# Altium PCB Baseboard-SupervisorElite.PcbDoc (part 1 of 8)
Units mm, origin at the board's own origin, x right, y up, seen from the top; angles counter-clockwise.
Board outline 120 x 90 mm, 6 copper layers (Top Layer, SIGNAL-1, PWR, SIGNAL-2, GND-2, Bottom Layer), stack 1.705 mm thick; 419 components, 315 nets, 1504 pads, 603 vias.
Unrouted connection lines stored in the file: 357.
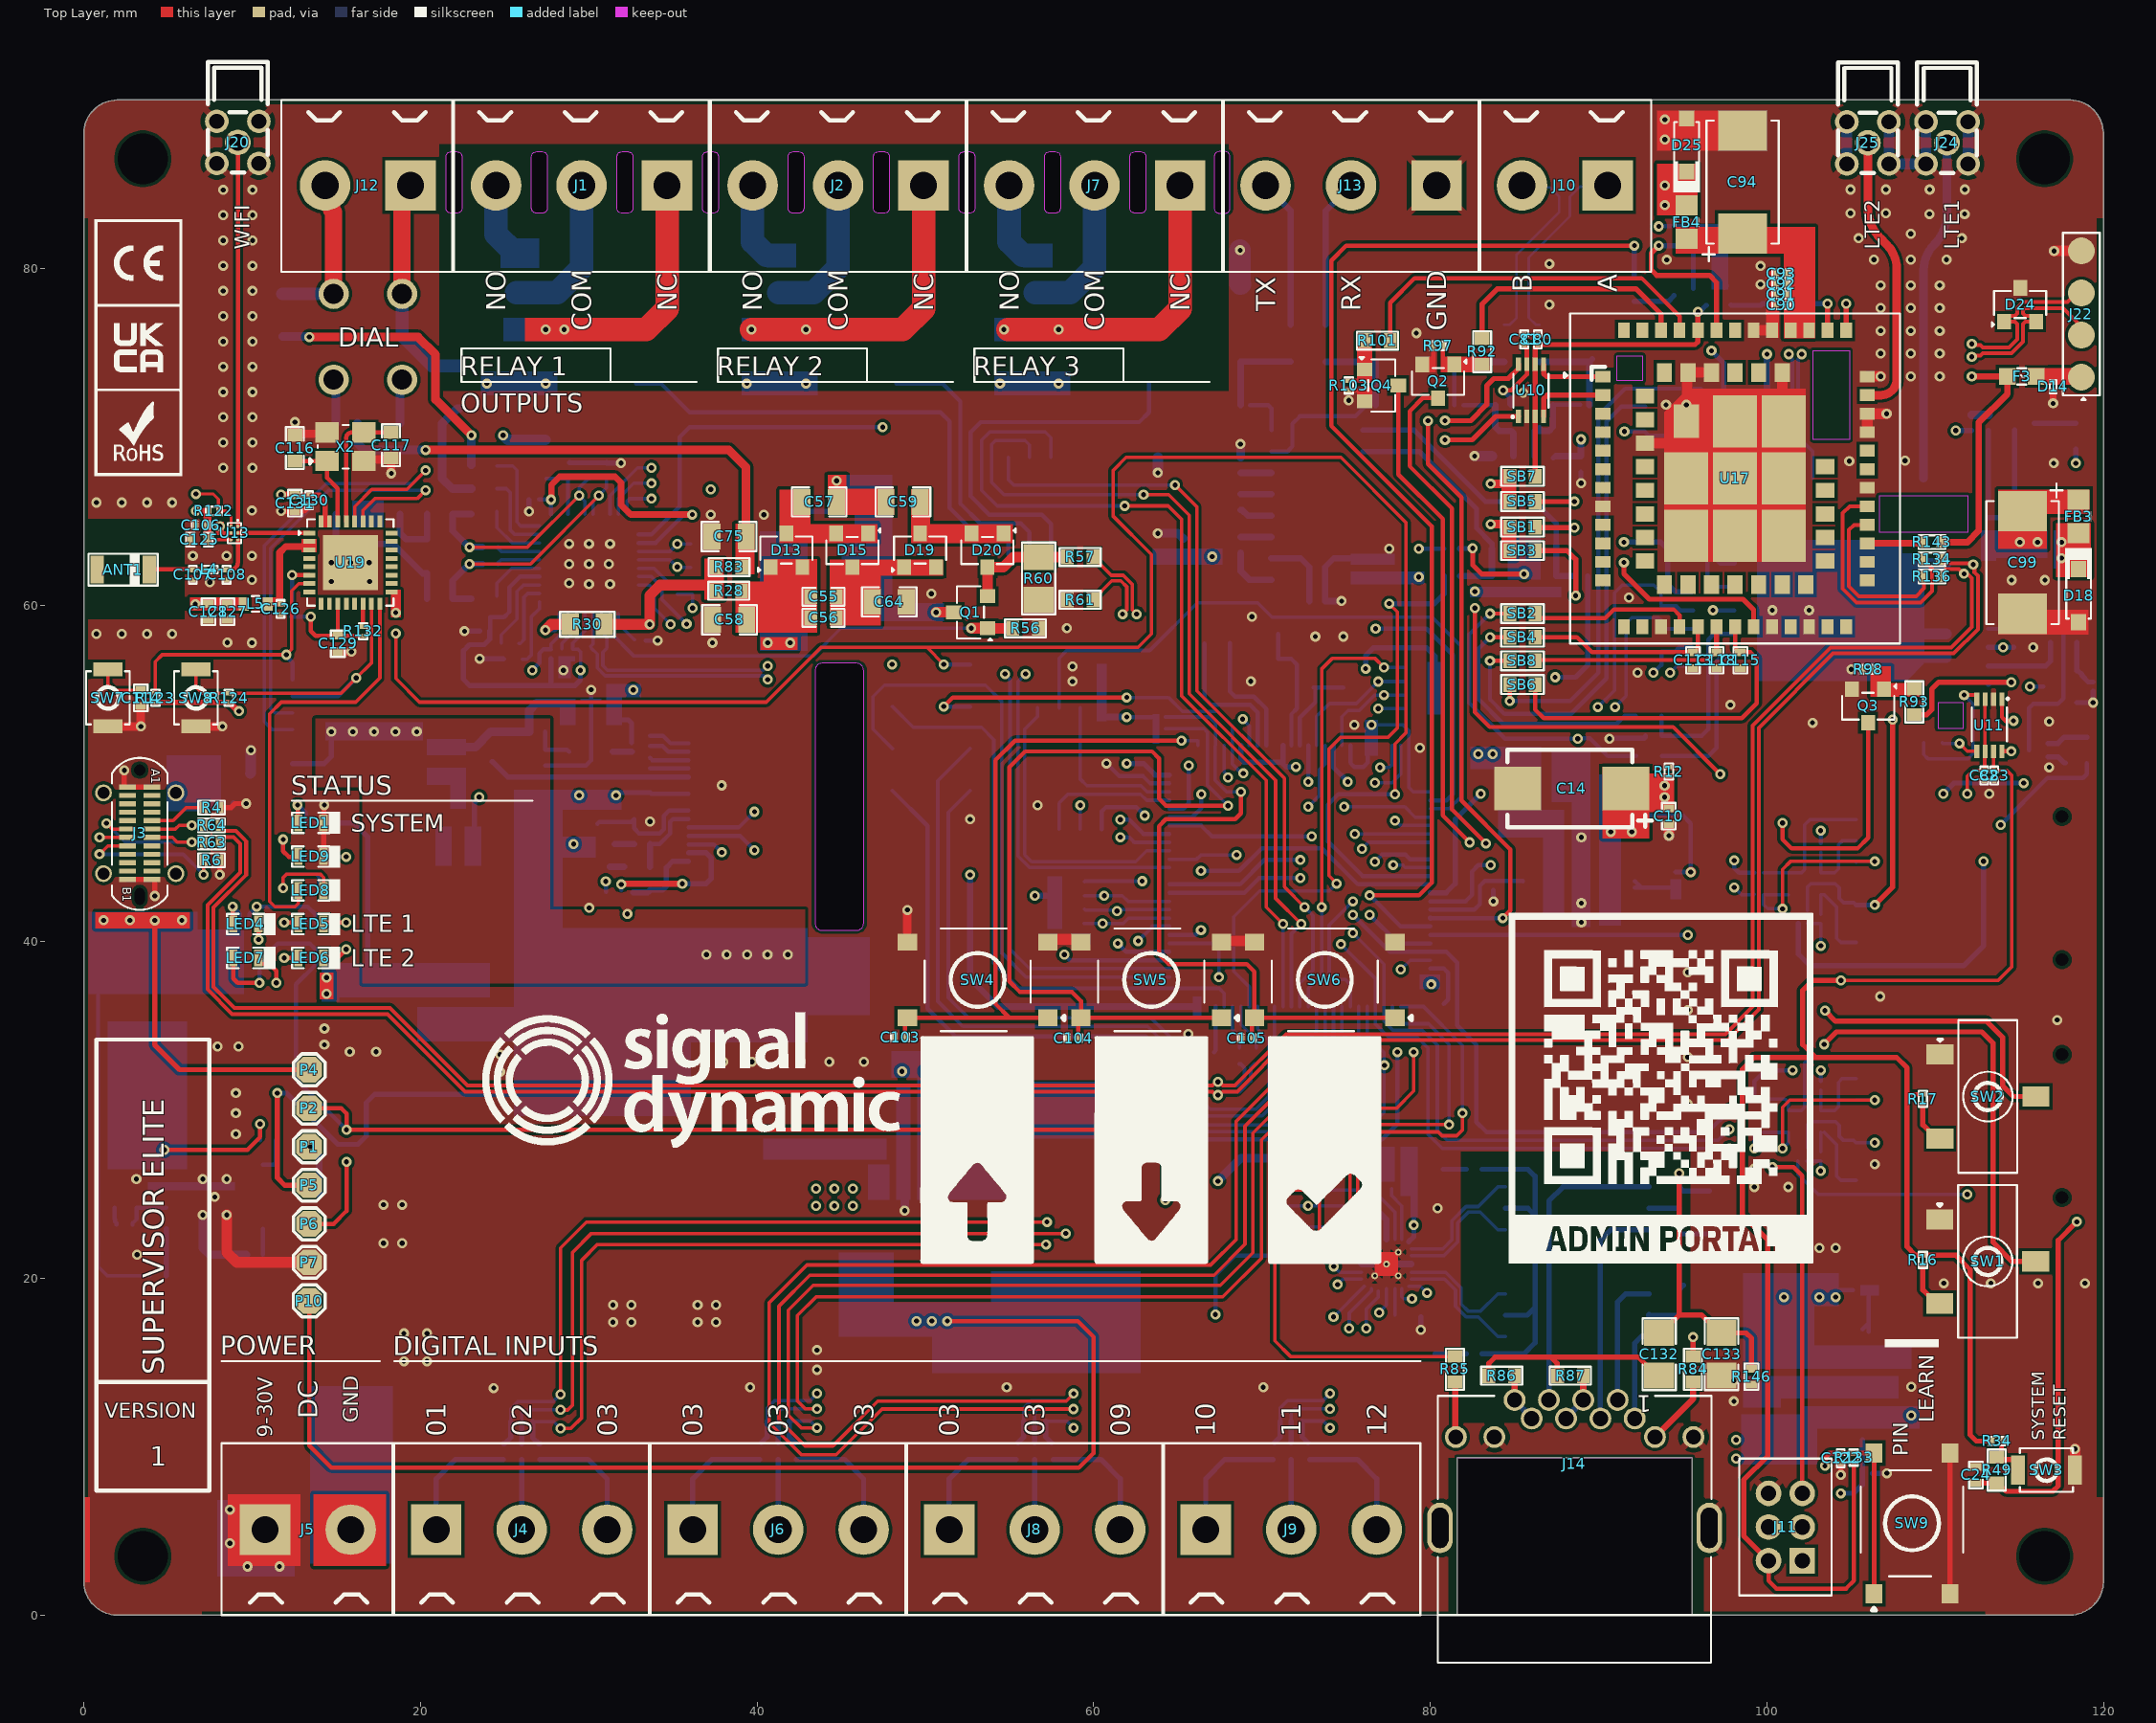
[diagram p0: Top Layer view]
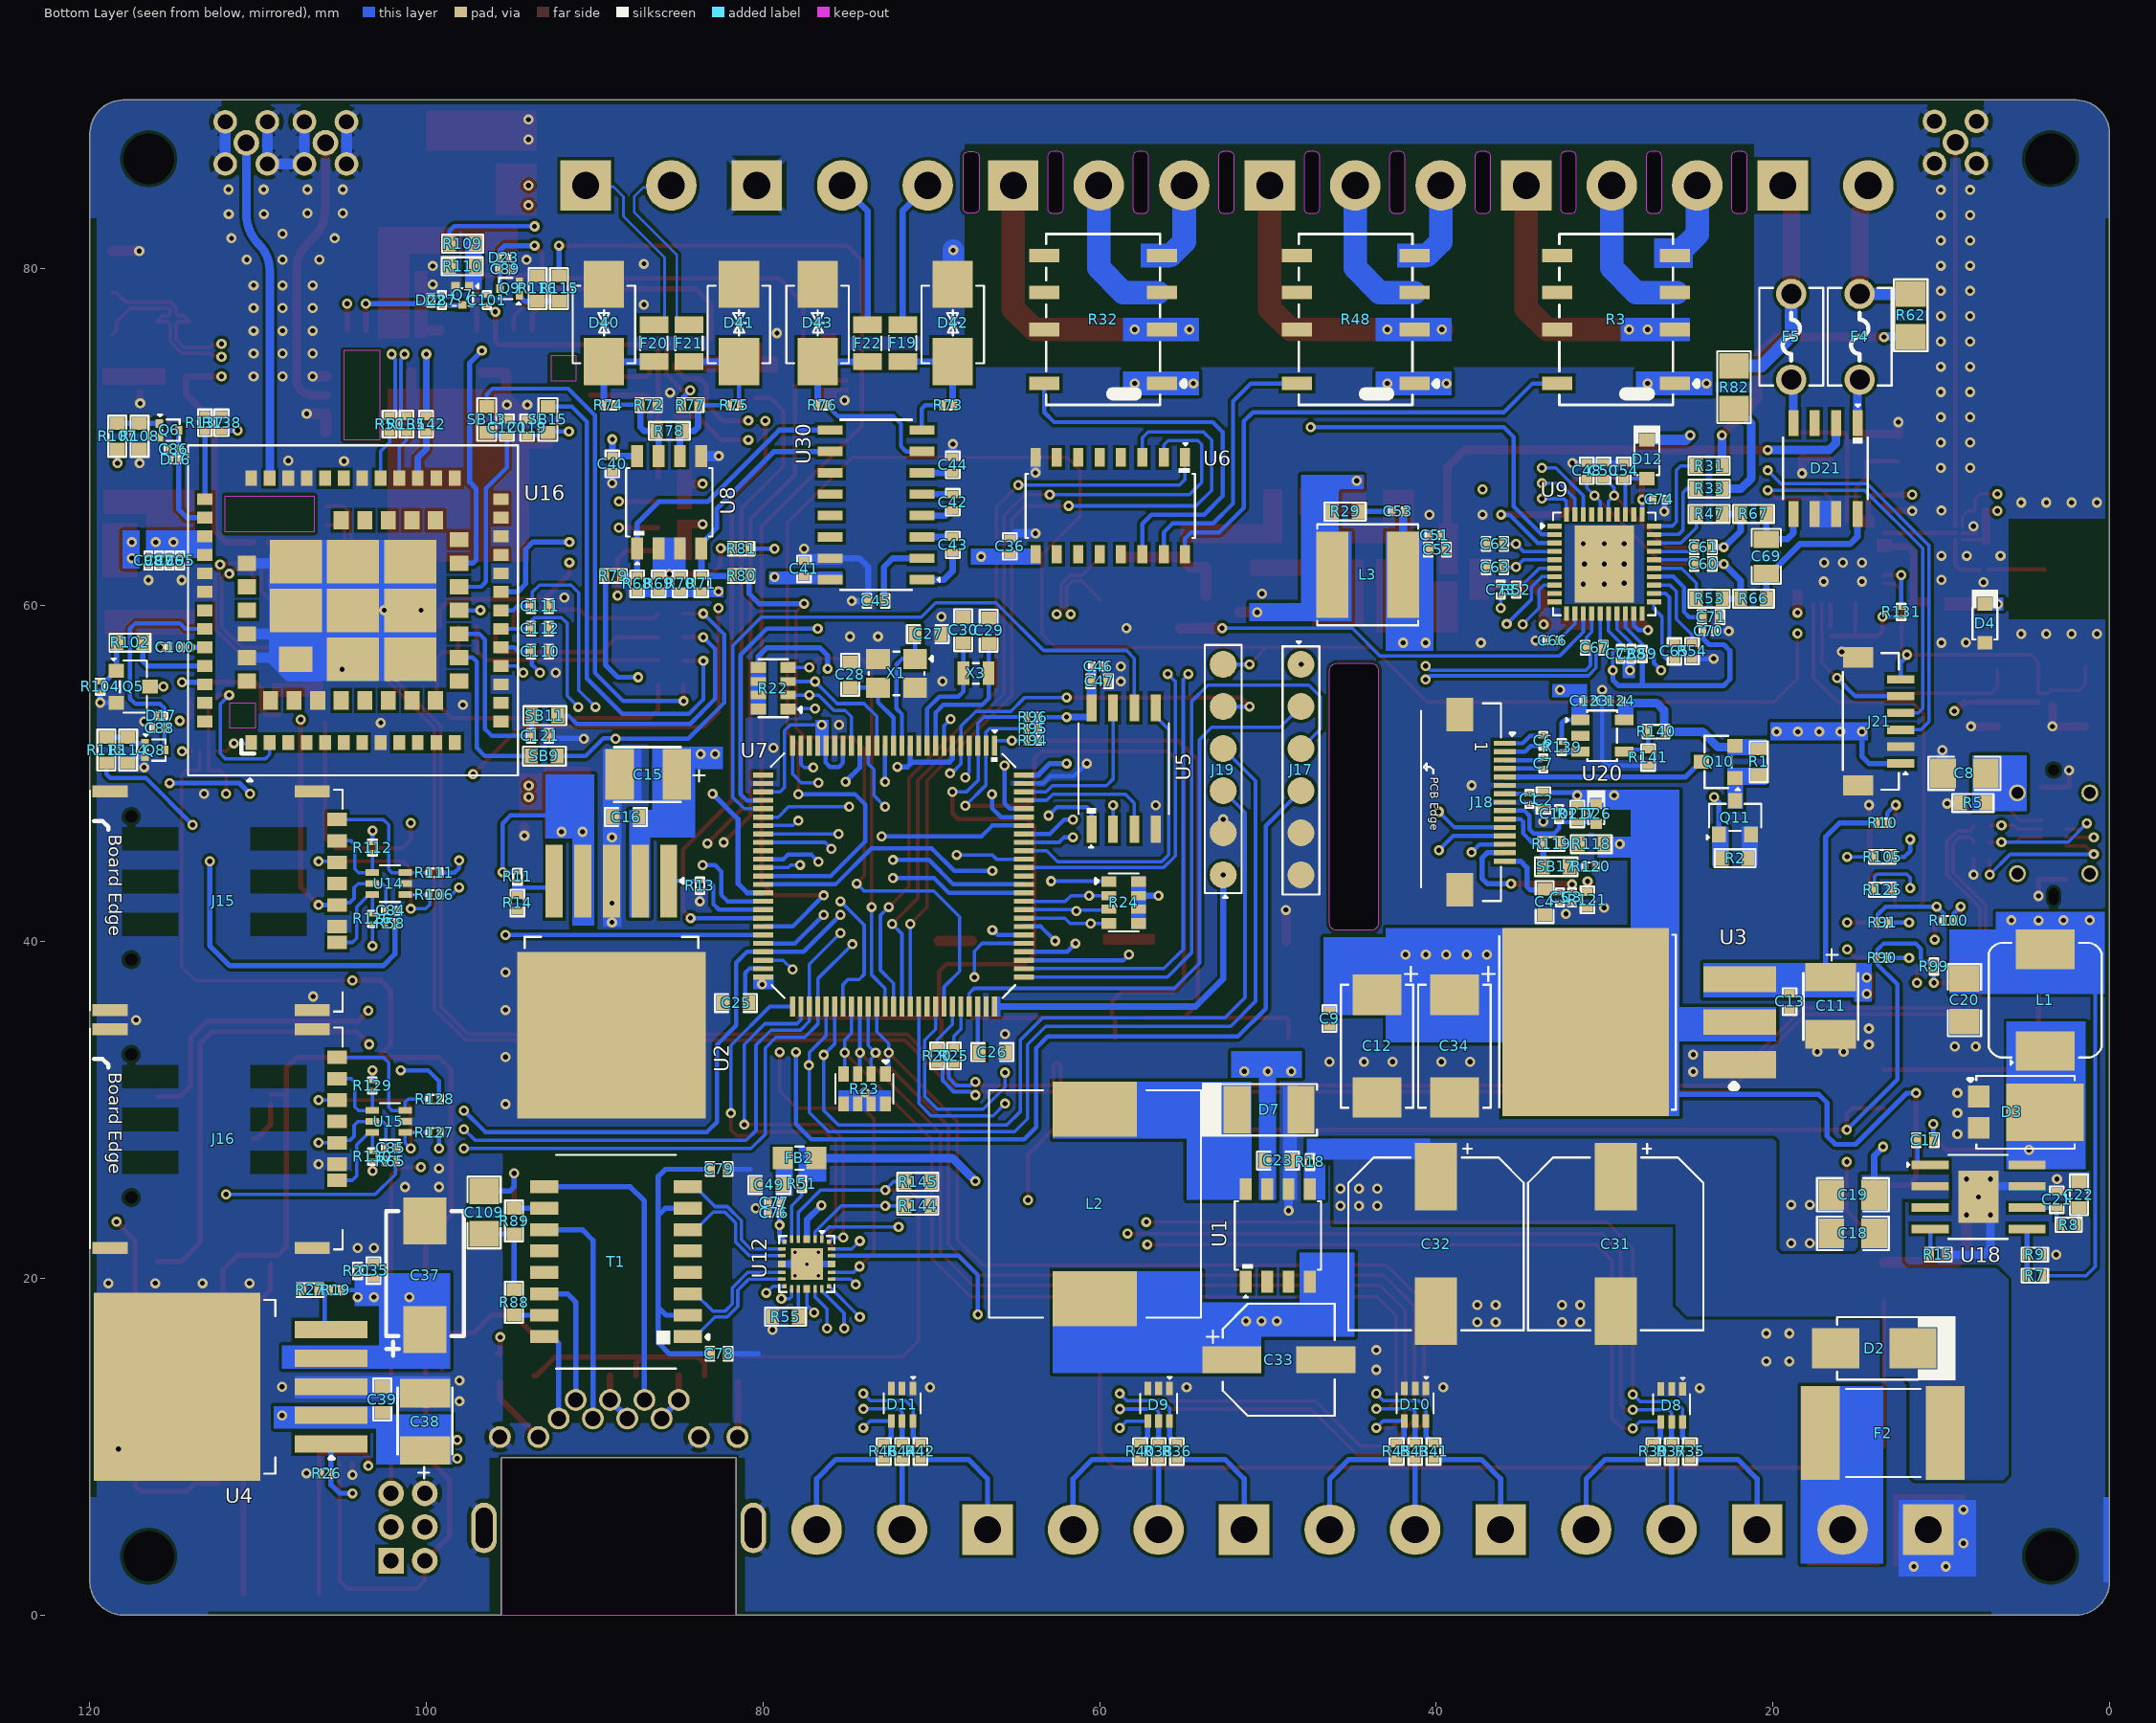
[diagram p1: Bottom Layer view, seen from below]
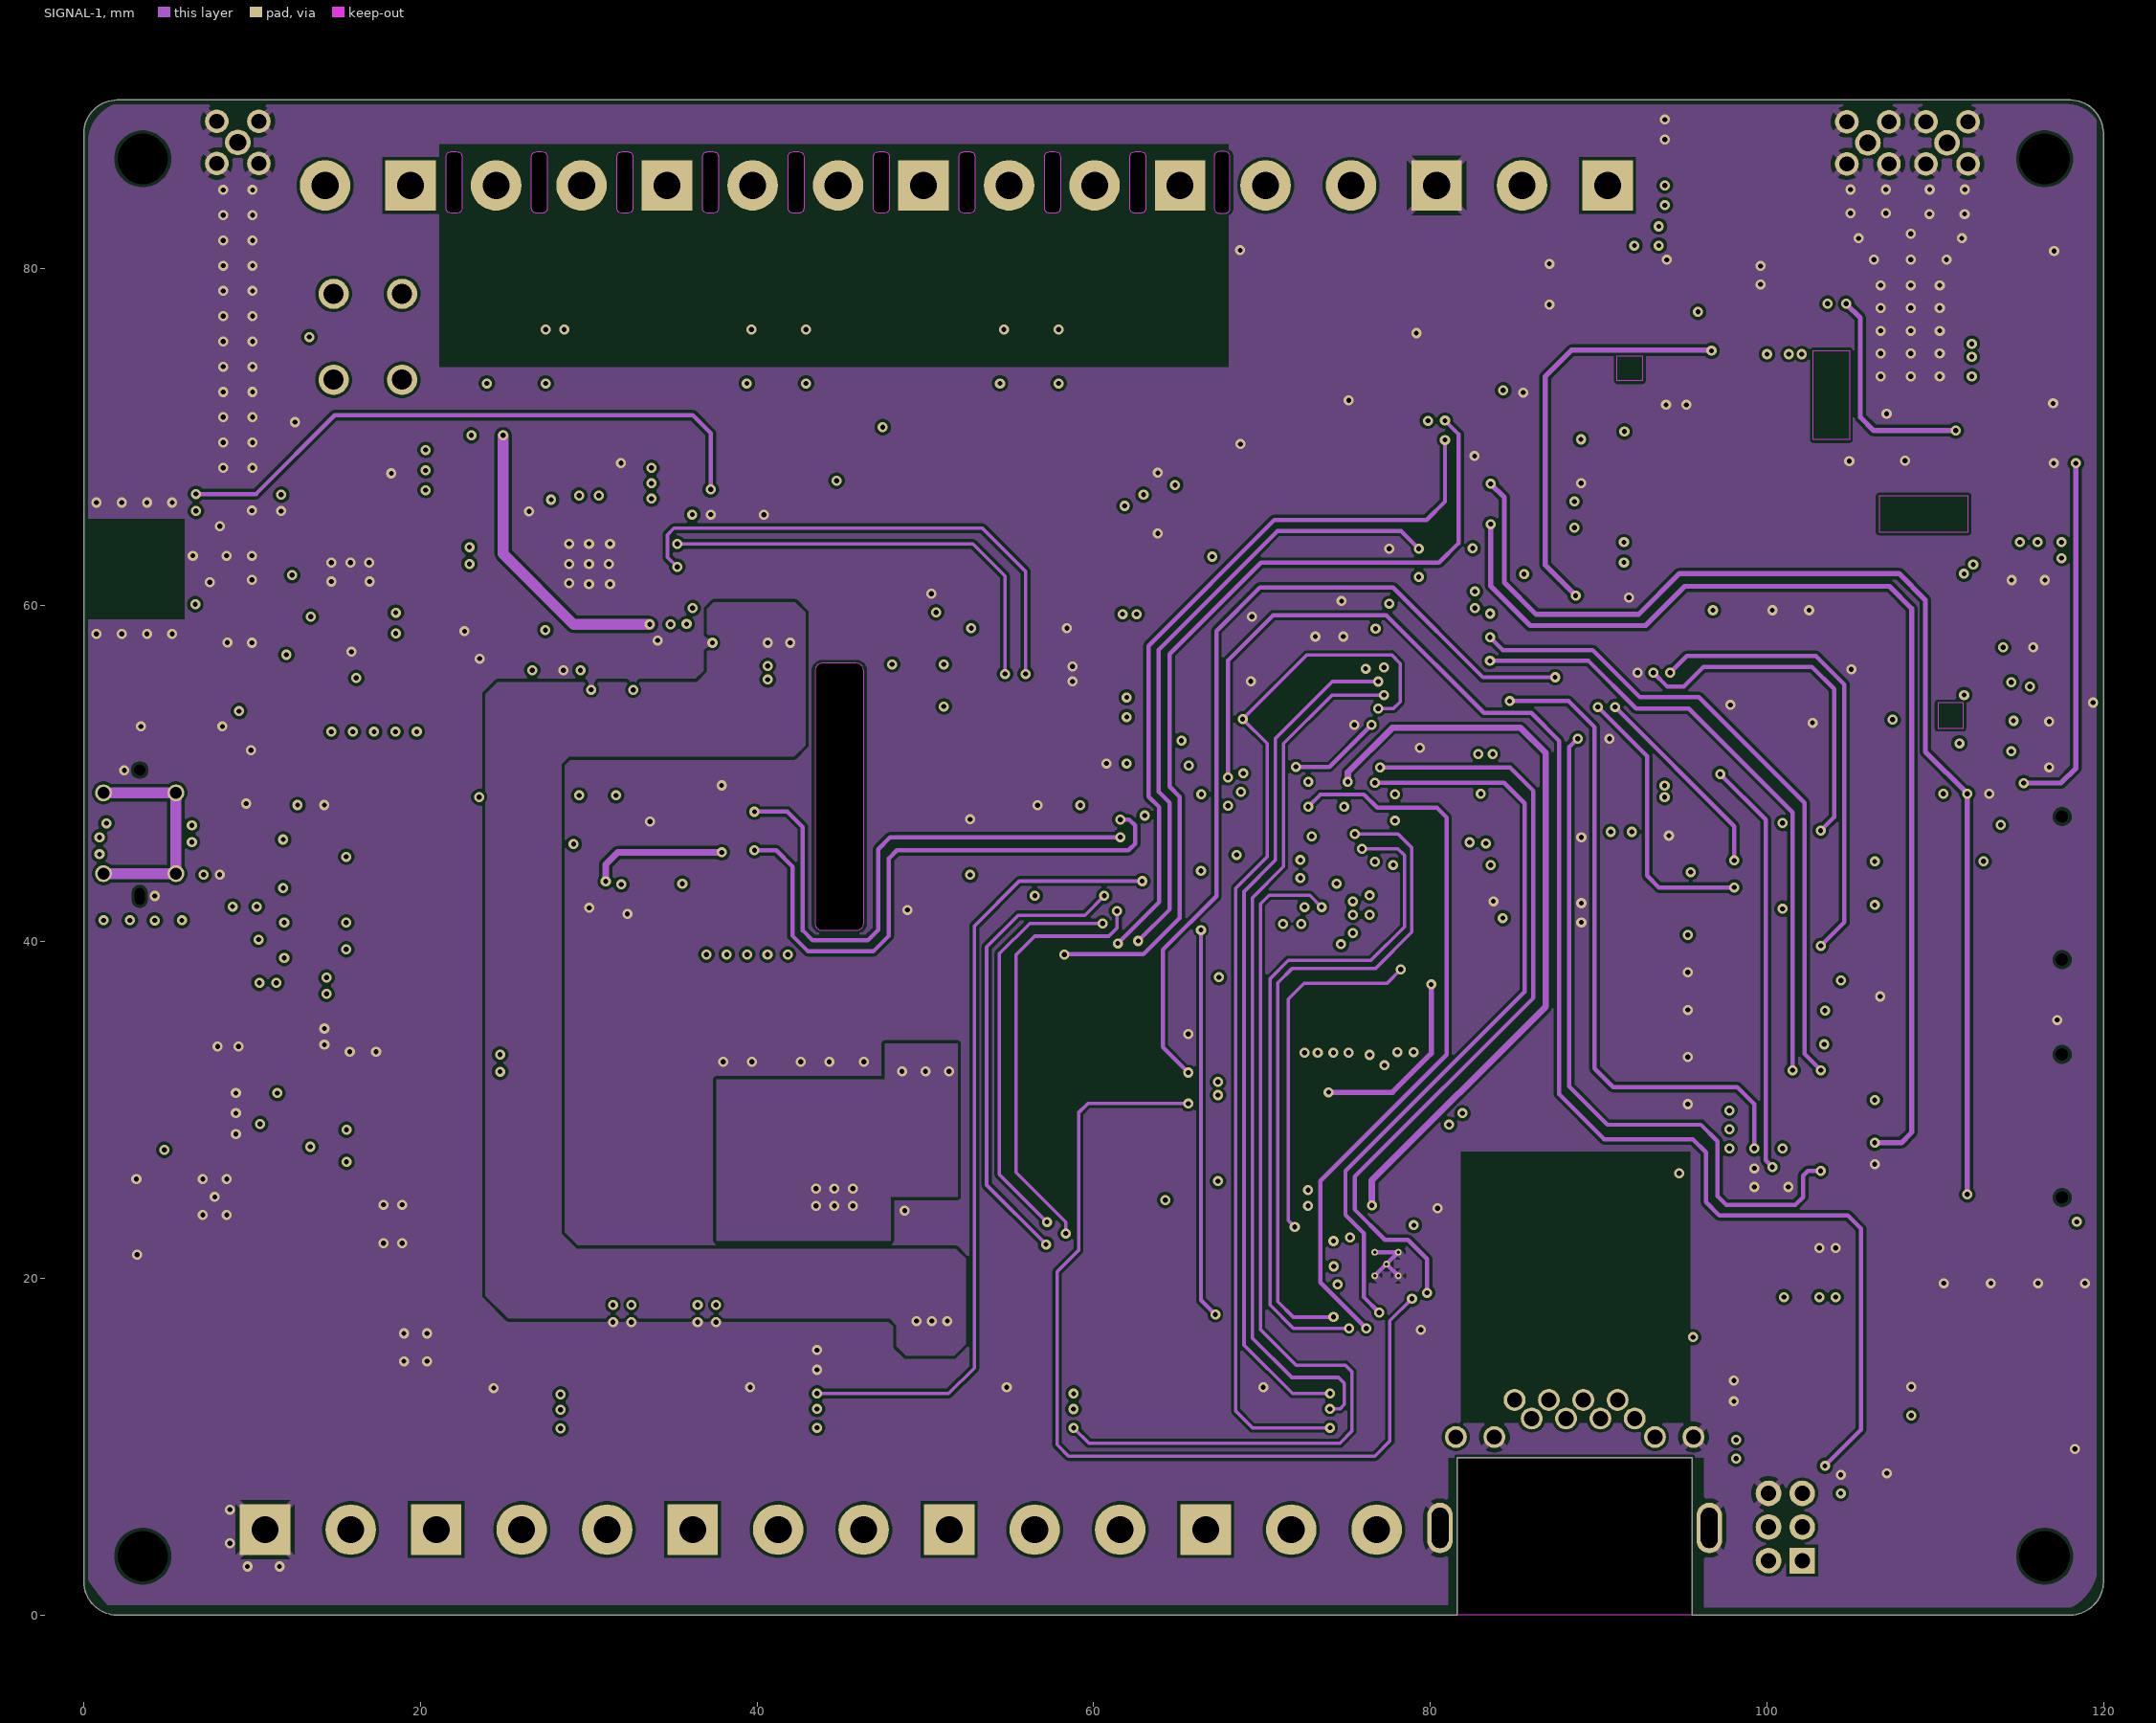
[diagram p2: SIGNAL-1]
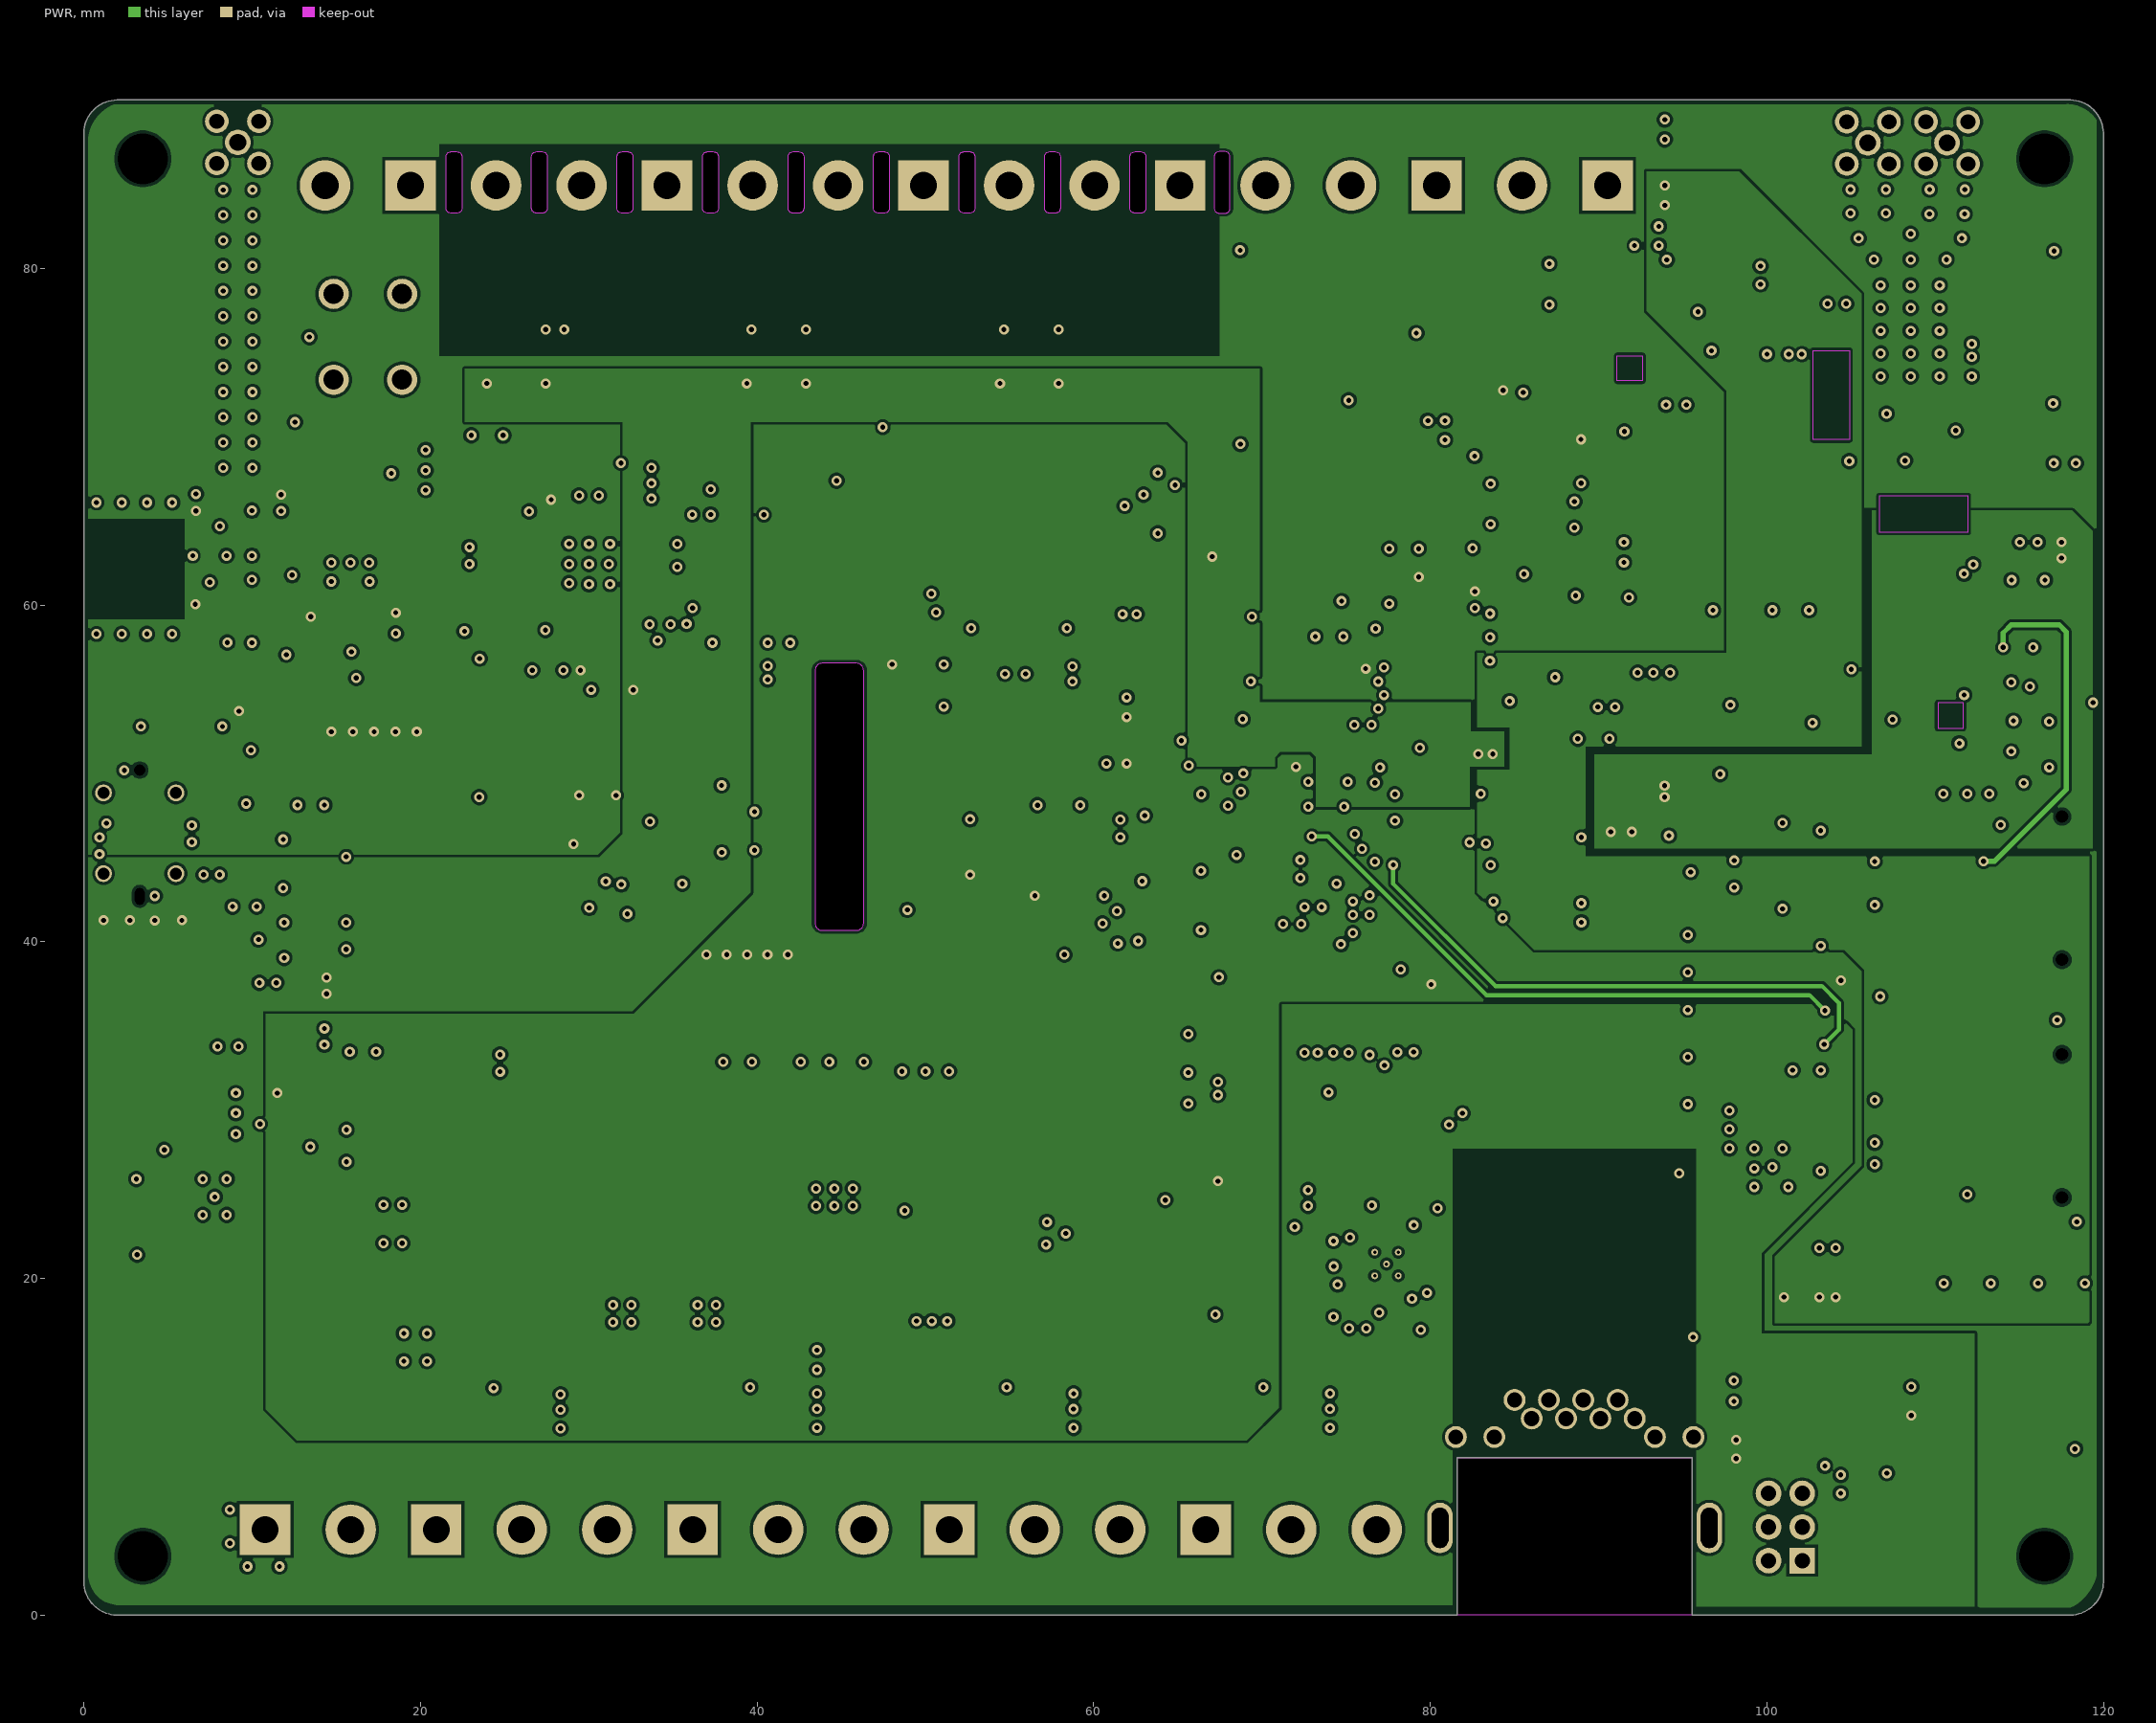
[diagram p3: PWR]
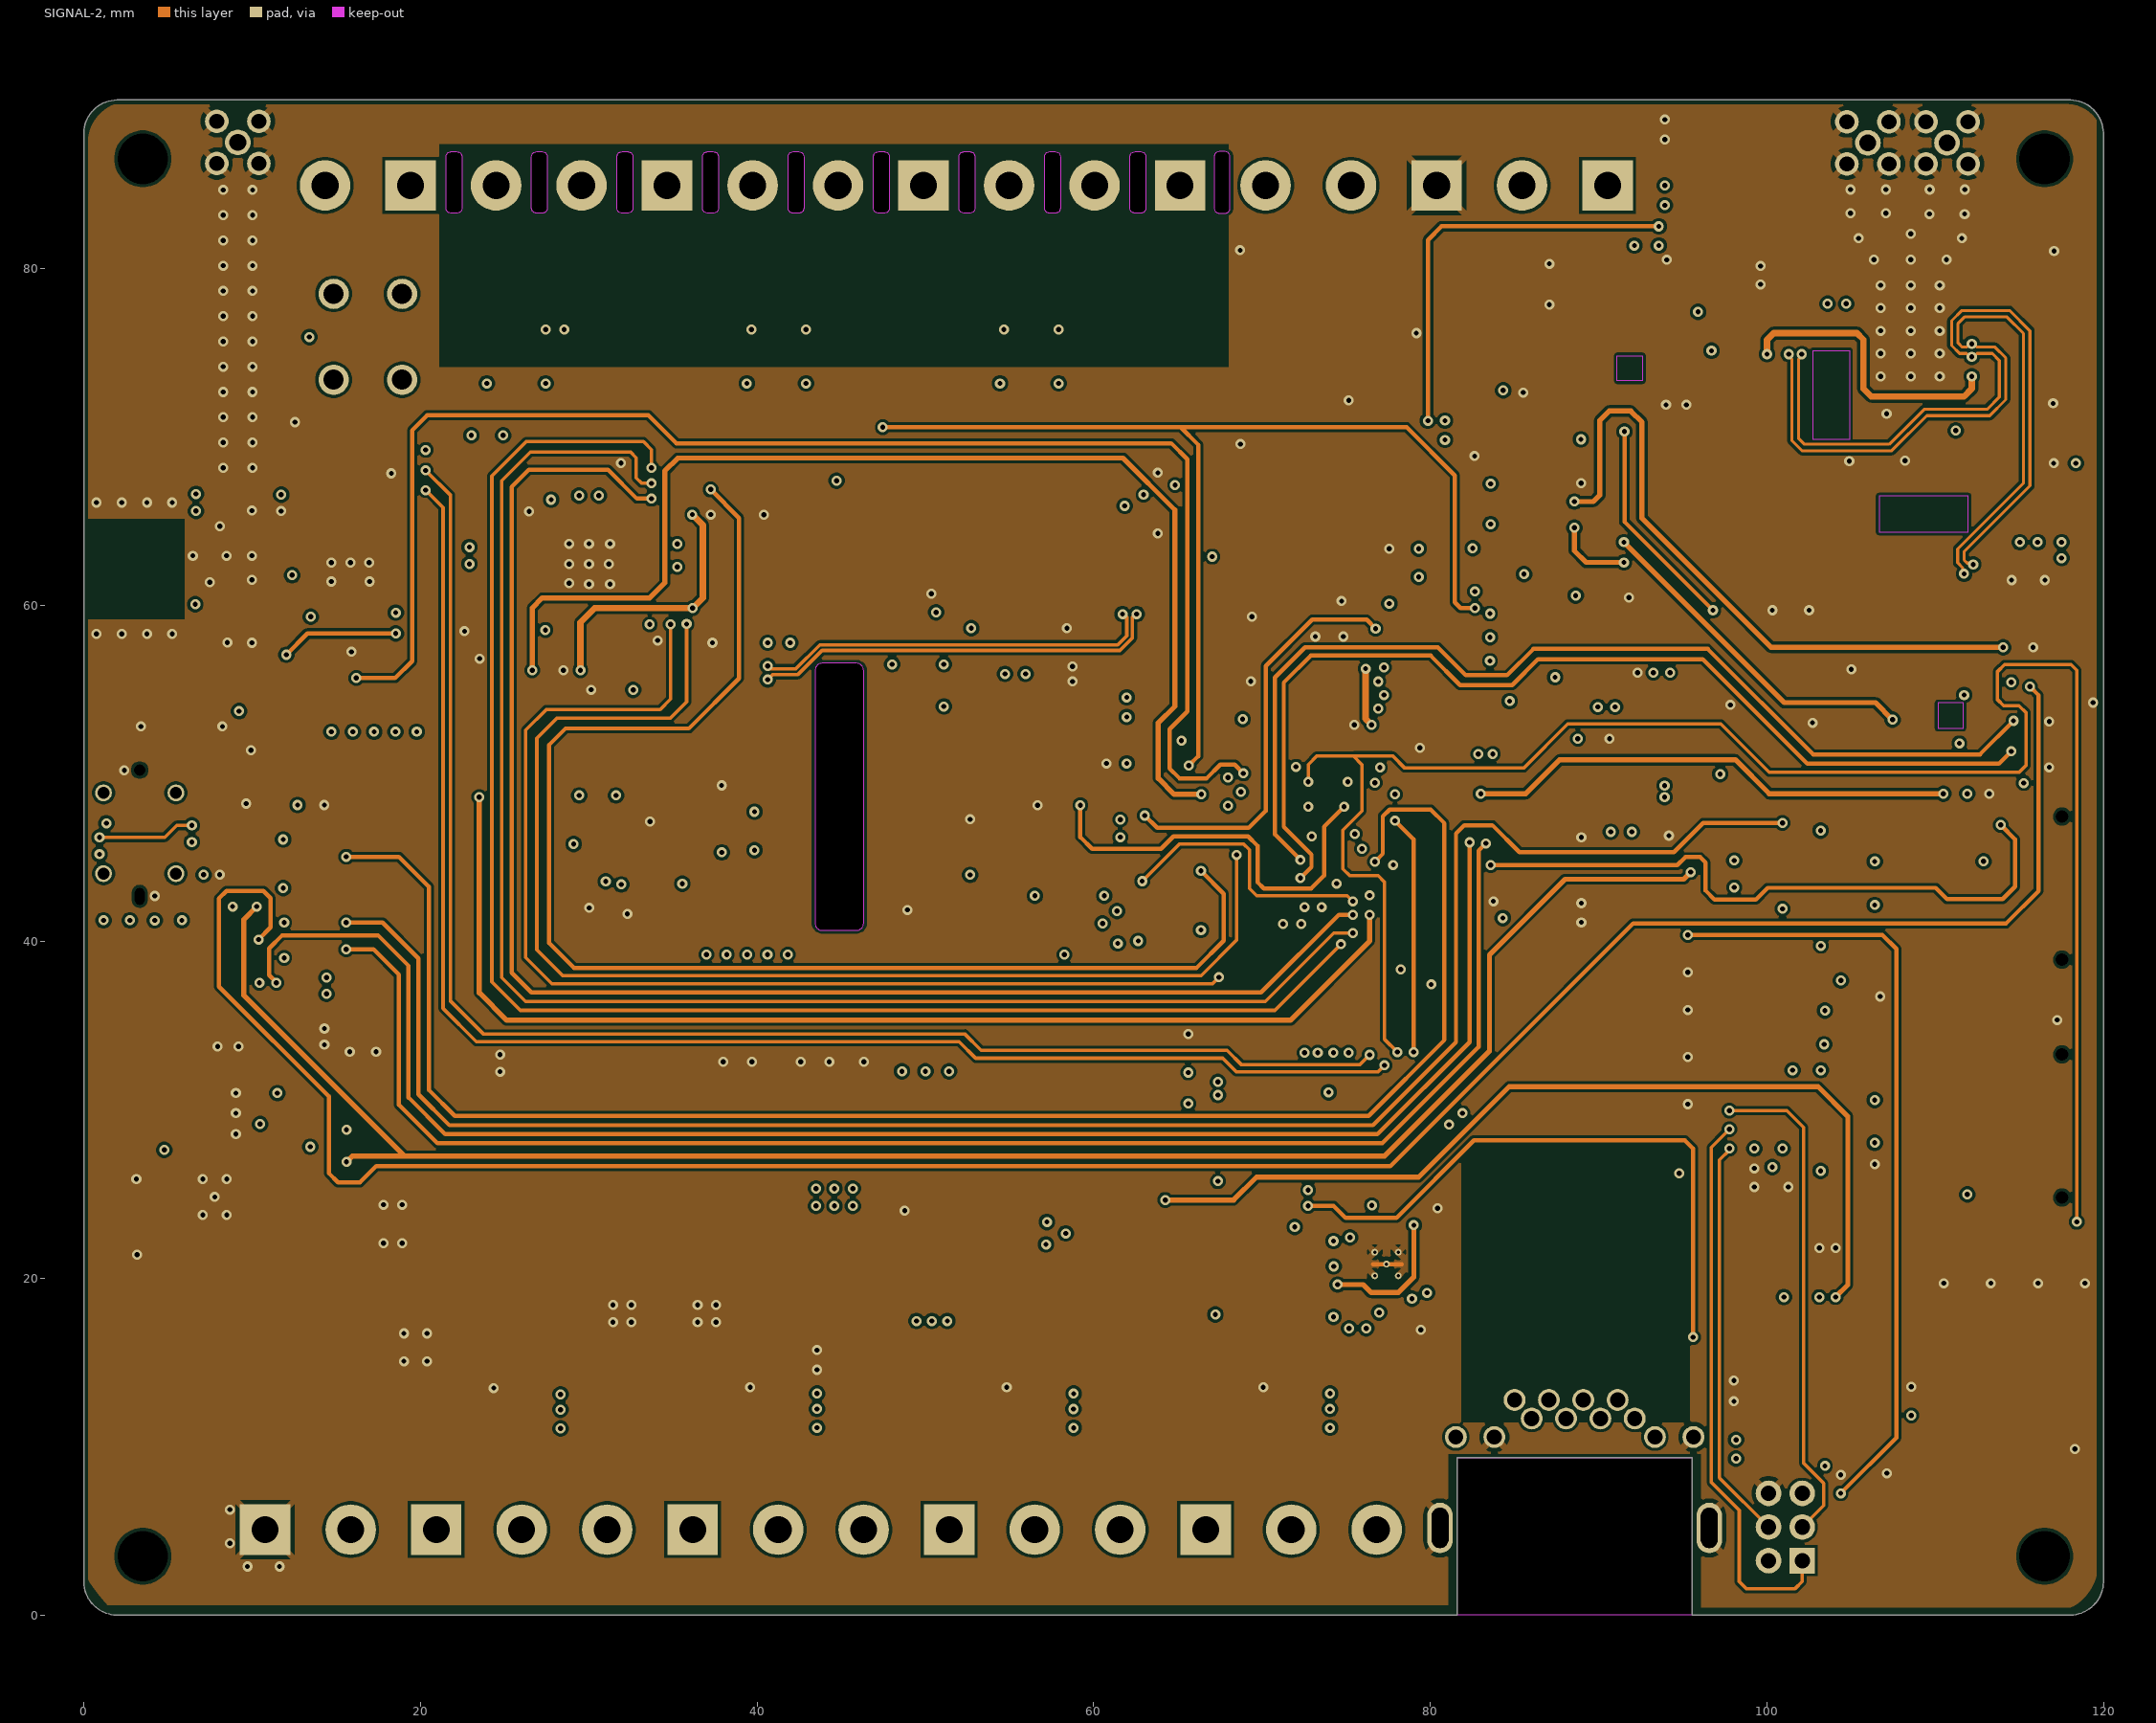
[diagram p4: SIGNAL-2]
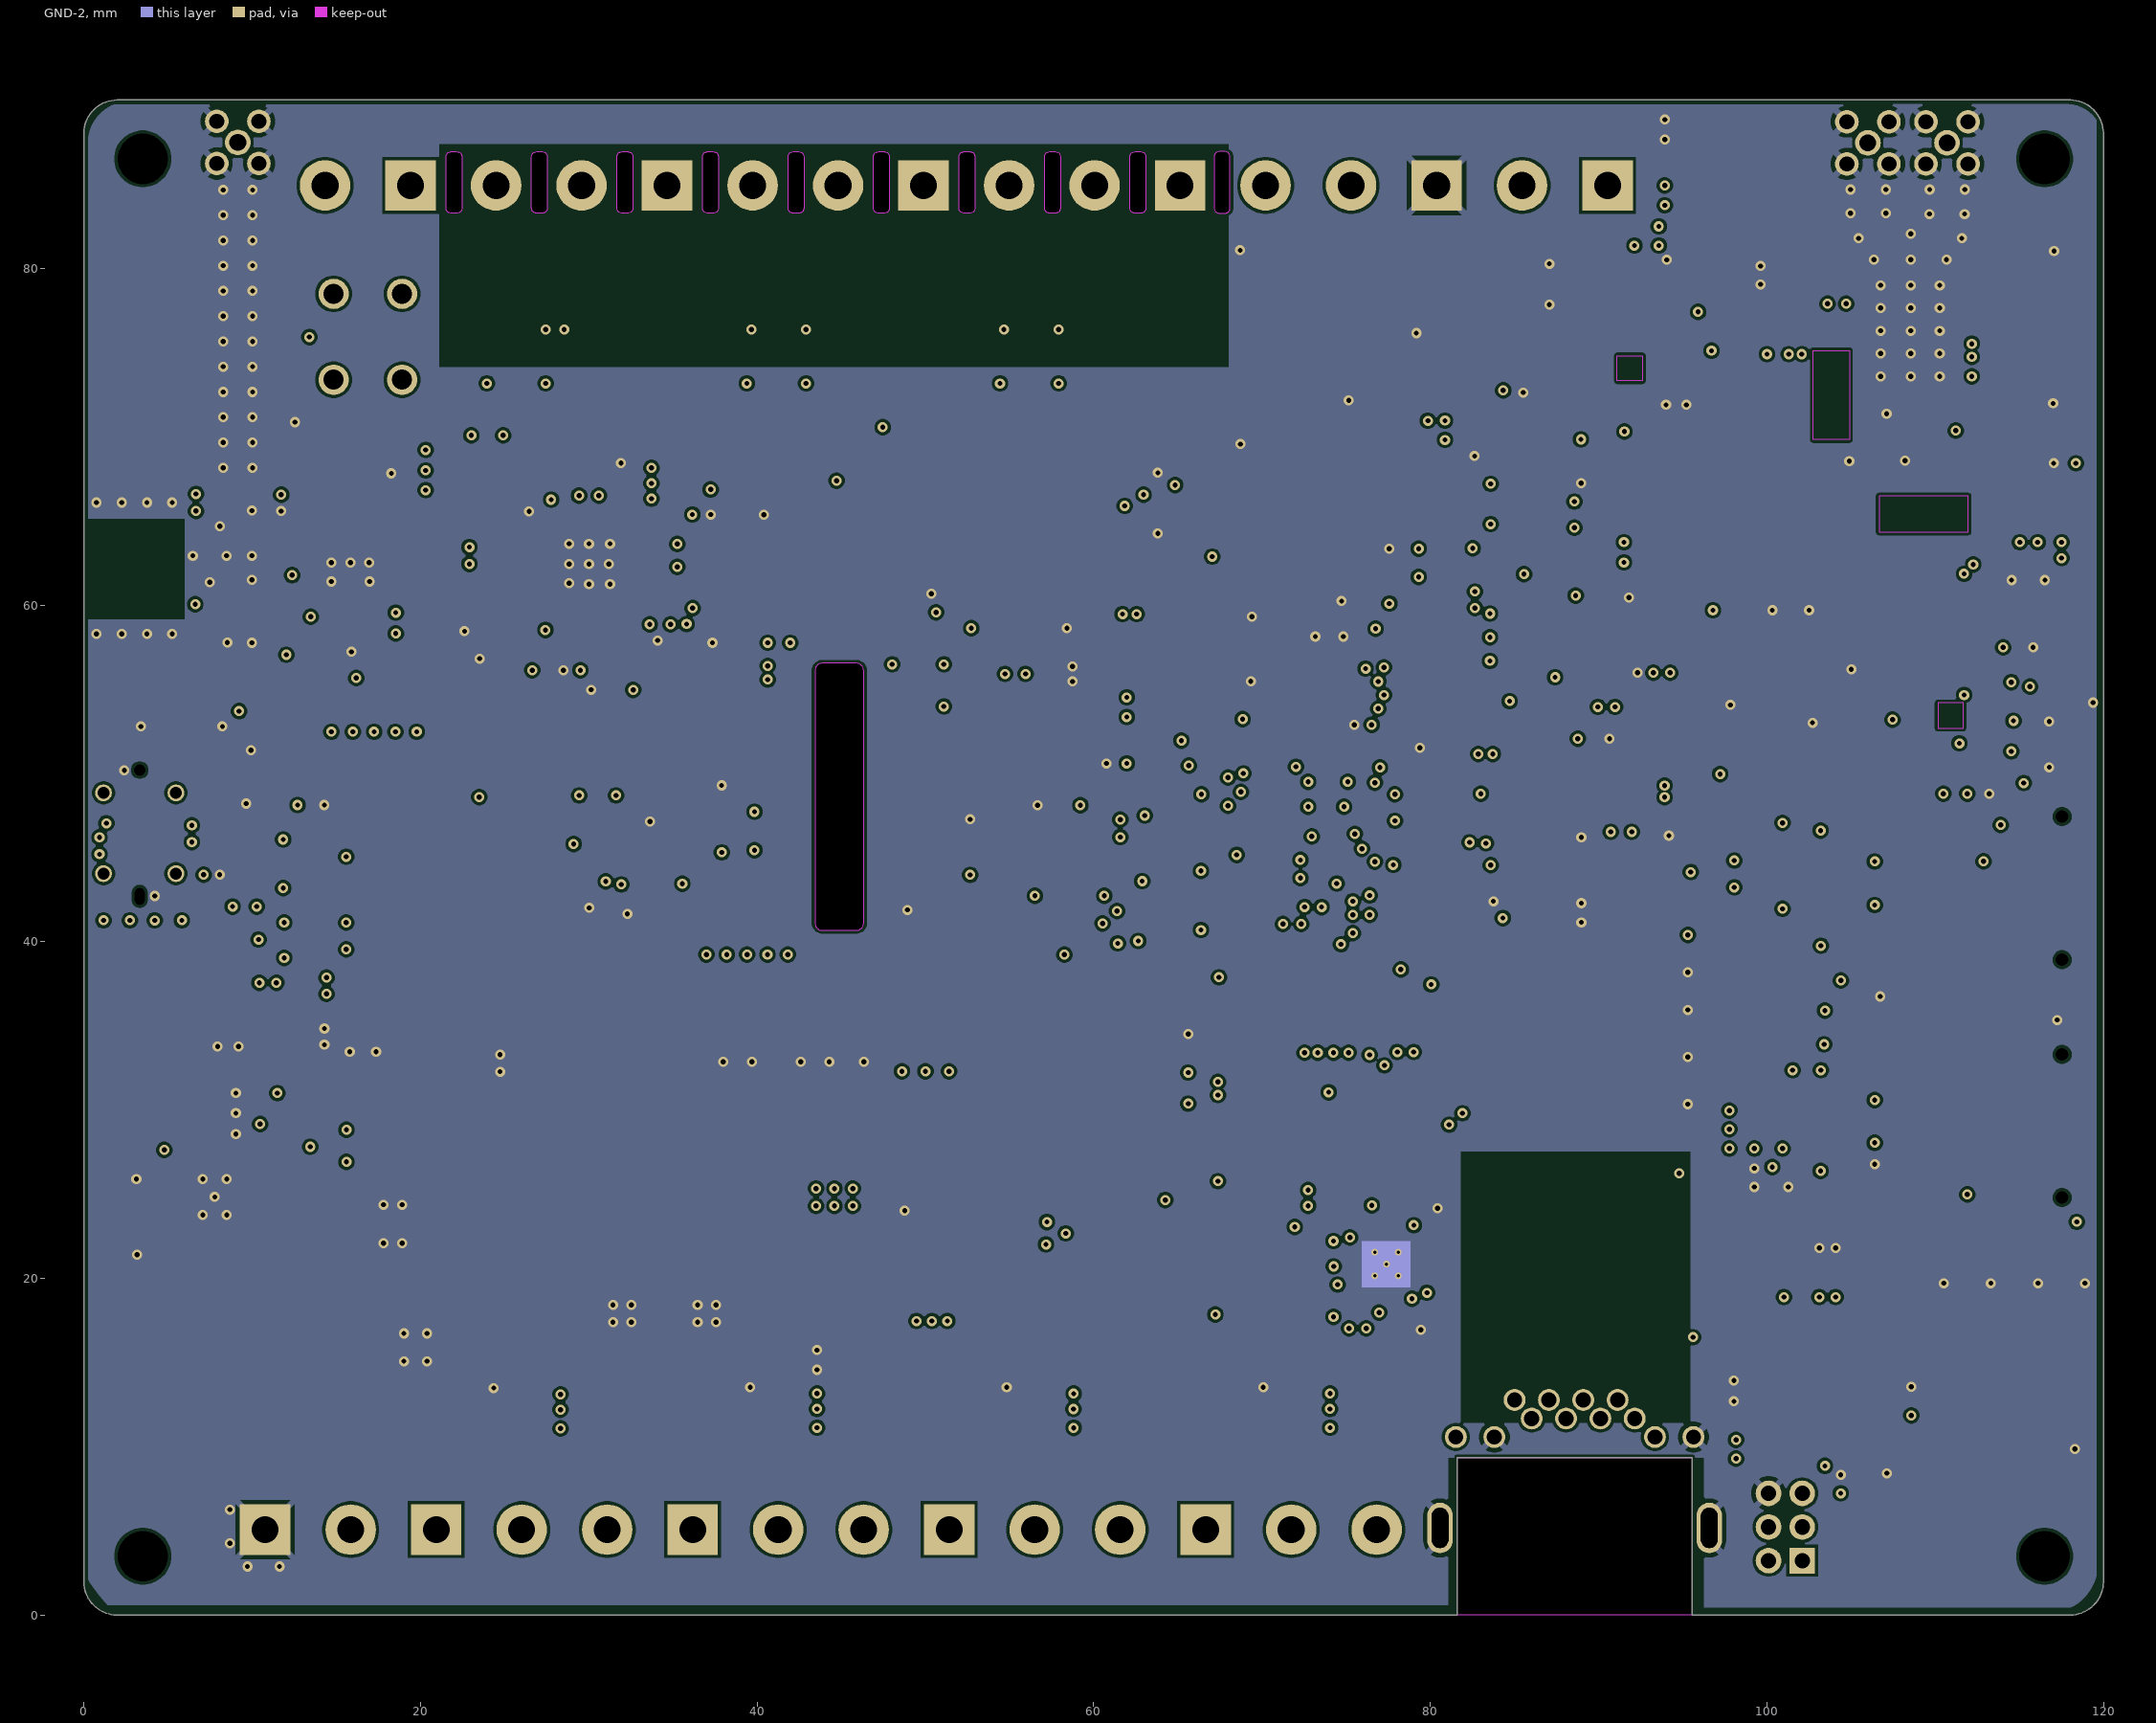
[diagram p5: GND-2]
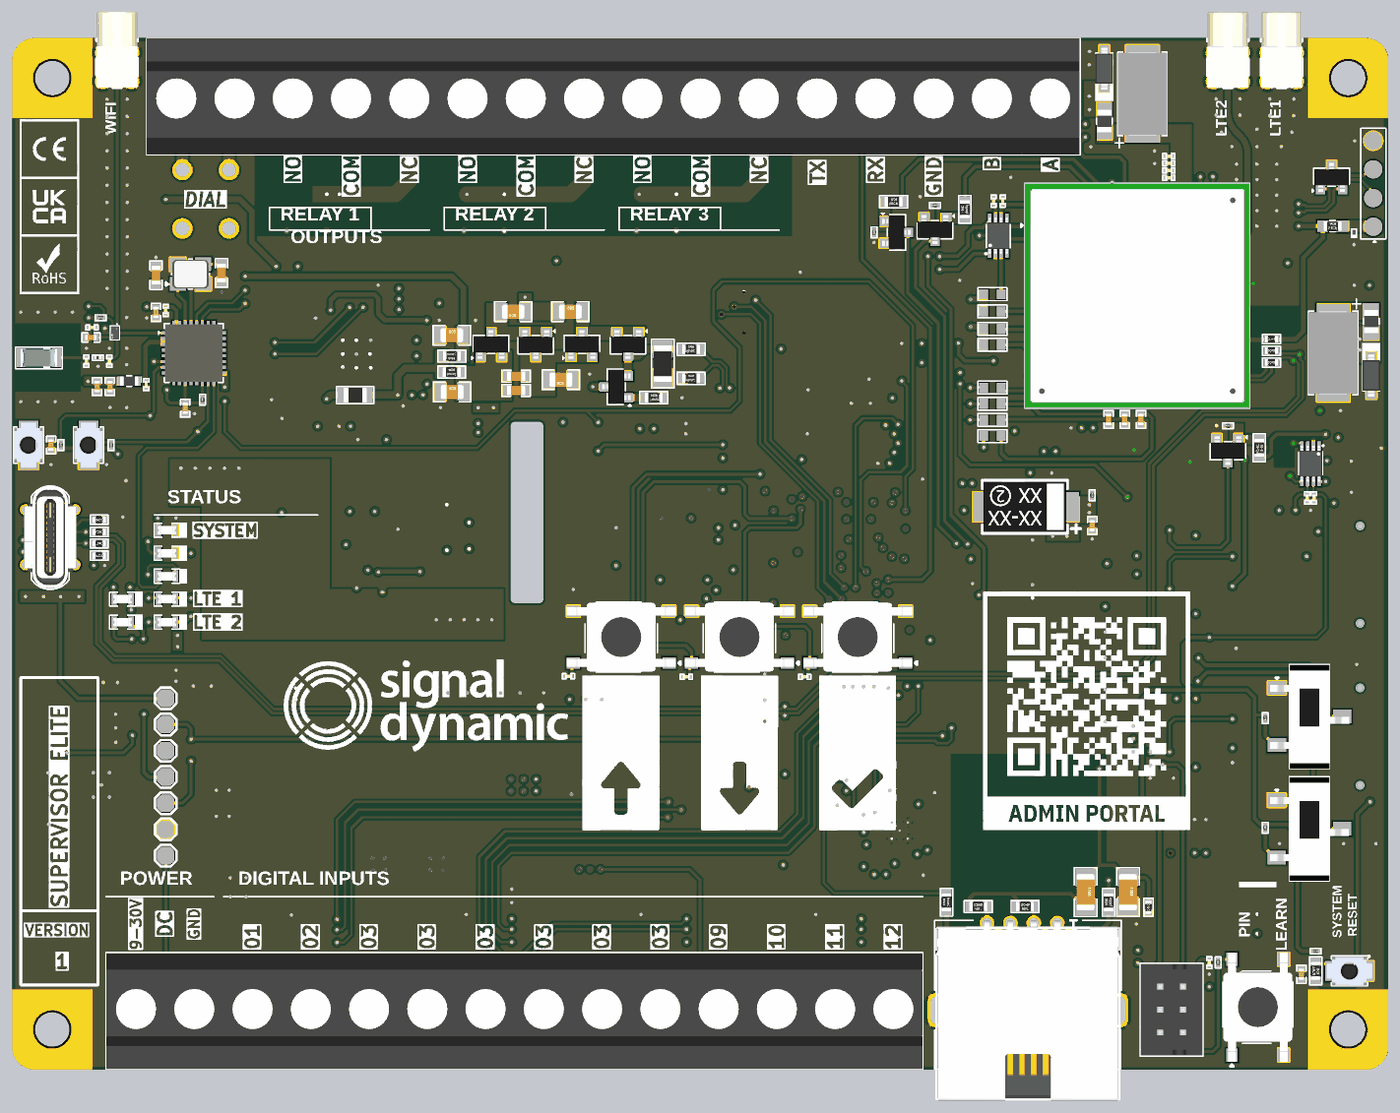
[diagram p10: 3D render of the assembled board from above, using the file's embedded part models]
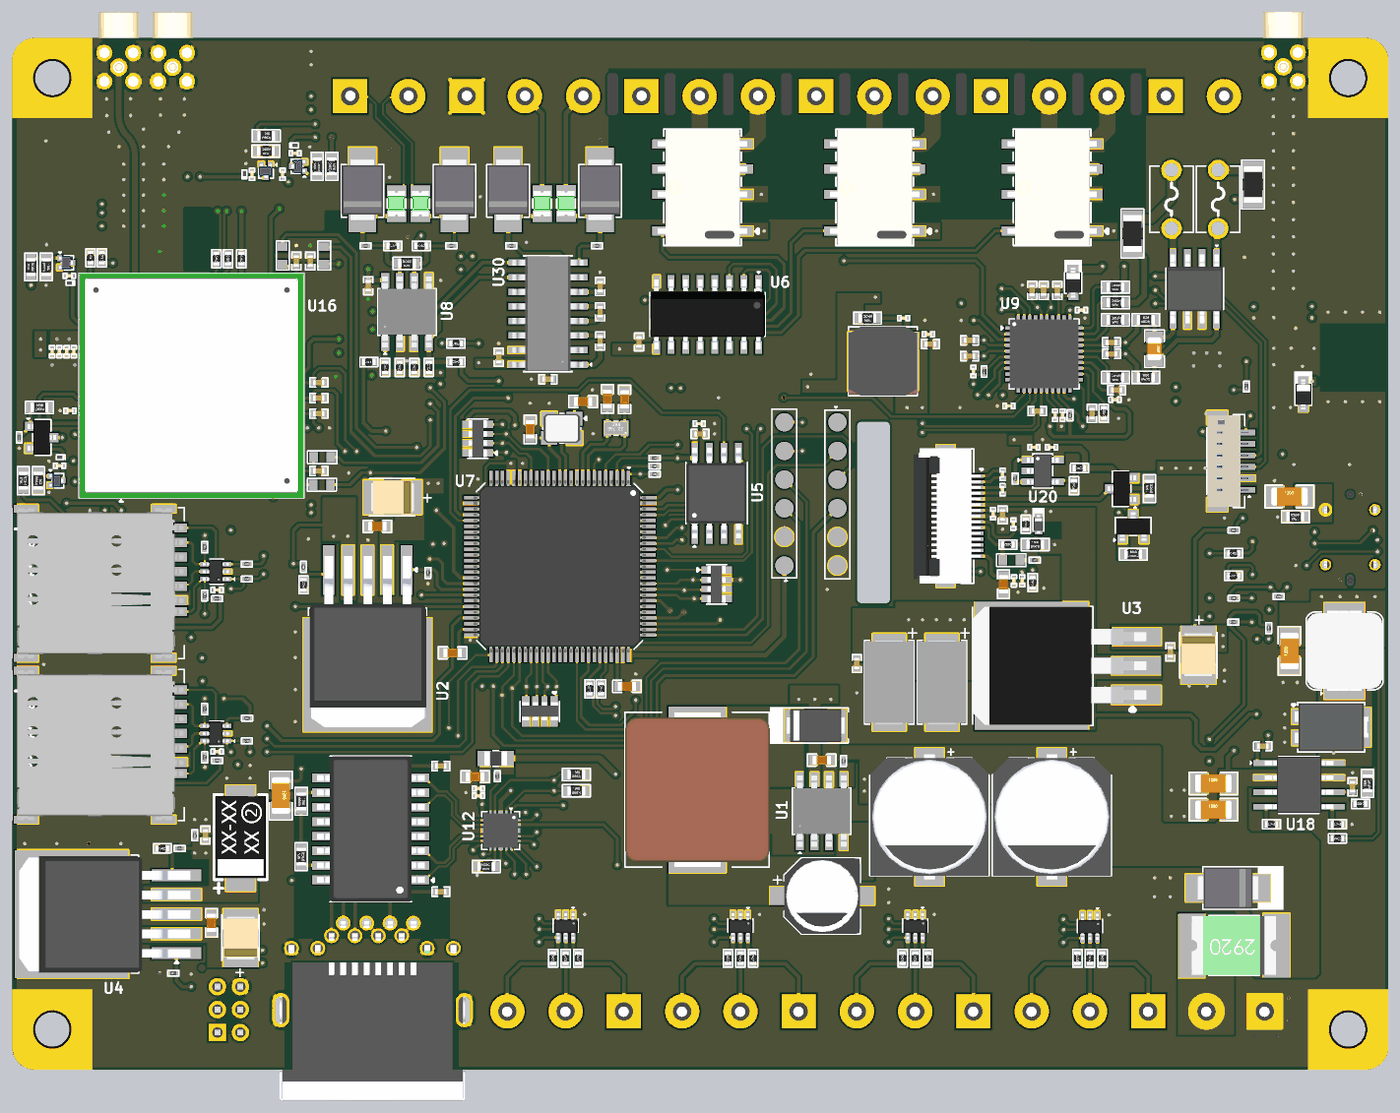
[diagram p11: 3D render of the assembled board from below, using the file's embedded part models]

## Layer stack, top to bottom
Top Solder: solder mask 0.0102, Solder Resist, Dk 3.5
Top Layer: signal copper 0.035
Dielectric 1: prepreg 0.203, PP-006, Dk 4.4
SIGNAL-1: signal copper 0.03
Dielectric 2: core 0.25, PP-006, Dk 4.6
PWR: signal copper 0.03
Dielectric 3: prepreg 0.203, PP-006, Dk 4.4
Dielectric 4: prepreg 0.203, FR-4, Dk 4.4
Dielectric 5: prepreg 0.203, PP-006, Dk 4.4
SIGNAL-2: signal copper 0.03
Dielectric 6: core 0.25, PP-006, Dk 4.6
GND-2: signal copper 0.03
Dielectric 7: prepreg 0.203, PP-006, Dk 4.4
Bottom Layer: signal copper 0.035
Bottom Solder: solder mask 0.0102, Solder Resist, Dk 3.5

## Board outline
0.003,1.965 ccw(c2.003,2) 1.96,0 81.598,0 81.598,9.36 95.565,9.36 95.565,0.003 118.035,0.003 ccw(c118.001,2.003) 120,1.96 119.997,1.963 119.997,88.035 ccw(c117.997,88) 118.04,90 118.037,89.997 1.965,89.997 ccw(c2,87.997) 0,88.04 0.003,88.037
cut-out: 43.442,41.106 ccw(c43.873,41.106) 43.873,40.674 45.905,40.674 ccw(c45.905,41.106) 46.337,41.106 46.337,56.106 ccw(c45.905,56.106) 45.905,56.538 43.873,56.538 ccw(c43.873,56.106) 43.442,56.106
cut-out: 68.106,83.567 68.106,86.631 ccw(c67.81,86.631) 67.81,86.926 67.463,86.926 ccw(c67.463,86.631) 67.168,86.631 67.168,83.567 ccw(c67.463,83.567) 67.463,83.272 67.81,83.272 ccw(c67.81,83.567)
cut-out: 21.524,83.567 21.524,86.631 cw(c21.819,86.631) 21.819,86.926 22.166,86.926 cw(c22.166,86.631) 22.461,86.631 22.461,83.567 cw(c22.166,83.567) 22.166,83.272 21.819,83.272 cw(c21.819,83.567)
cut-out: 26.899,83.272 cw(c26.899,83.567) 26.604,83.567 26.604,86.631 cw(c26.899,86.631) 26.899,86.926 27.246,86.926 cw(c27.246,86.631) 27.541,86.631 27.541,83.567 cw(c27.246,83.567) 27.246,83.272
cut-out: 31.684,83.567 31.684,86.631 cw(c31.979,86.631) 31.979,86.926 32.326,86.926 cw(c32.326,86.631) 32.621,86.631 32.621,83.567 cw(c32.326,83.567) 32.326,83.272 31.979,83.272 cw(c31.979,83.567)
cut-out: 36.764,83.567 36.764,86.631 cw(c37.059,86.631) 37.059,86.926 37.406,86.926 cw(c37.406,86.631) 37.701,86.631 37.701,83.567 cw(c37.406,83.567) 37.406,83.272 37.059,83.272 cw(c37.059,83.567)
cut-out: 52.004,83.567 52.004,86.631 cw(c52.299,86.631) 52.299,86.926 52.646,86.926 cw(c52.646,86.631) 52.941,86.631 52.941,83.567 cw(c52.646,83.567) 52.646,83.272 52.299,83.272 cw(c52.299,83.567)
cut-out: 62.459,83.272 cw(c62.459,83.567) 62.164,83.567 62.164,86.631 cw(c62.459,86.631) 62.459,86.926 62.806,86.926 cw(c62.806,86.631) 63.101,86.631 63.101,83.567 cw(c62.806,83.567) 62.806,83.272
cut-out: 57.084,83.567 57.084,86.631 cw(c57.379,86.631) 57.379,86.926 57.726,86.926 cw(c57.726,86.631) 58.021,86.631 58.021,83.567 cw(c57.726,83.567) 57.726,83.272 57.379,83.272 cw(c57.379,83.567)
cut-out: 46.924,83.567 46.924,86.631 cw(c47.219,86.631) 47.219,86.926 47.566,86.926 cw(c47.566,86.631) 47.861,86.631 47.861,83.567 cw(c47.566,83.567) 47.566,83.272 47.219,83.272 cw(c47.219,83.567)
cut-out: 42.139,83.272 cw(c42.139,83.567) 41.844,83.567 41.844,86.631 cw(c42.139,86.631) 42.139,86.926 42.486,86.926 cw(c42.486,86.631) 42.781,86.631 42.781,83.567 cw(c42.486,83.567) 42.486,83.272
cut-out: 81.596,-0.002 81.596,9.363 95.562,9.363 95.562,0.001 95.561,0

## Design rules (kind name [scope] priority, off if disabled: settings)
Clearance [All] p1: gap=0.178 ignorepadtopadclearanceinfootprint=TRUE except(0.102: Arc-SMDPad Track-SMDPad SMDPad-SMDPad; 0.127: Arc-Arc Arc-Track Track-Track)
ComponentClearance [All] p1: gap=0 collisioncheckmode=3 verticalgap=0 showdistances=FALSE
DiffPairsRouting DiffPairsRouting_USB [InDifferentialPairClass('USB_Lines')] p1: maxlimit=0.254 minlimit=0.127 mostfreqgap=0.203 toplayer_maxgap=0.127 toplayer_prefgap=0.127 toplayer_minwidth=0.229 toplayer_maxwidth=0.229 toplayer_prefwidth=0.229 midlayer2_mingap=0.203 midlayer2_maxgap=0.203 midlayer2_minwidth=0.178 midlayer2_maxwidth=0.178 midlayer2_prefwidth=0.178 midlayer3_mingap=0.203 midlayer3_maxgap=0.203 midlayer3_minwidth=0.178 midlayer3_maxwidth=0.178 midlayer3_prefwidth=0.178 bottomlayer_maxgap=0.127 bottomlayer_prefgap=0.127 bottomlayer_minwidth=0.229 bottomlayer_maxwidth=0.229 bottomlayer_prefwidth=0.229 impedanceprofiledriven=TRUE impedanceprofileid={CF6B66EF-4077-4927-83E6-265DED3C5DF2} impedanceprofilevalue=90.000000 maxuncoupledlength=12.7
DiffPairsRouting DiffPairs_RS485 [InDifferentialPairClass('RS485_LINES')] p2: maxlimit=0.254 minlimit=0.203 mostfreqgap=0.254 toplayer_maxgap=0.203 toplayer_prefgap=0.203 toplayer_minwidth=0.152 toplayer_maxwidth=0.152 toplayer_prefwidth=0.152 bottomlayer_maxgap=0.203 bottomlayer_prefgap=0.203 bottomlayer_minwidth=0.152 bottomlayer_maxwidth=0.152 bottomlayer_prefwidth=0.152 impedanceprofiledriven=TRUE impedanceprofileid={52FA0E87-B910-4617-AB39-B053A52313FF} impedanceprofilevalue=120.000000 maxuncoupledlength=12.7
HoleSize [All] p1: absolutevalues=TRUE maxlimit=25.4 minlimit=0.025 maxpercent=80.000 minpercent=20.000
MatchedLengths "Schematic Matched Net Lengths_1" [InNetClass('EtherCAT_A')] p1: tolerance=0.508 checknetsindiffpair=FALSE checkdiffpairvsdiffpair=TRUE checkxsignals=TRUE checkothers=TRUE
MatchedLengths "Schematic Matched Net Lengths" [InNetClass('USB')] p2: tolerance=0.508 checknetsindiffpair=TRUE checkdiffpairvsdiffpair=FALSE checkxsignals=FALSE checkothers=FALSE
MatchedLengths "Schematic Matched Net Lengths_2" [InNetClass('RS485')] p3: tolerance=0.508 checknetsindiffpair=TRUE checkdiffpairvsdiffpair=FALSE checkxsignals=FALSE checkothers=FALSE
MaxMinImpedance "Schematic Impedance Constraint" [InNetClass('EtherCAT_A')] p1: minimum=85.00 maximum=95.00
MaxMinImpedance "Schematic Impedance Constraint_1" [InNetClass('USB')] p2: minimum=88.00 maximum=90.00
MaxMinImpedance "Schematic Impedance Constraint_2" [InNetClass('RS485')] p3: minimum=115.0 maximum=120.0
MinimumSolderMaskSliver [All] p1: minsoldermaskwidth=0
PolygonConnect [All] p1: thpad.connectstyle=Relief thpad.reliefconductorwidth=0.381 thpad.reliefentries=4 thpad.polygonreliefangle="45 Angle" thpad.airgapwidth=0.254 smdpad.connectstyle=Direct smdpad.reliefconductorwidth=0.254 smdpad.reliefentries=4 smdpad.polygonreliefangle="90 Angle" smdpad.airgapwidth=0.254 via.connectstyle=Direct via.reliefconductorwidth=0.254 via.reliefentries=4 via.polygonreliefangle="90 Angle" via.airgapwidth=0.254
RoutingVias [All] p1: holewidth=0.3 width=0.6 viastyle="Through Hole" minholewidth=0.3 minwidth=0.6 maxholewidth=0.3 maxwidth=0.6
SilkToSilkClearance [All] p1: silktosilkclearance=0
SilkToSolderMaskClearance [IsPad] p1: minsilkscreentomaskgap=0 clearancetoexposedcopper=TRUE
SolderMaskExpansion SolderMaskExpansion_VIA [ISVIA] p1: expansion=0.102 istentingtop=TRUE
SolderMaskExpansion [All] p2: expansion=0.102 istentingtop=FALSE
UnRoutedNet [All] p1: checkbadconnections=TRUE
Width [All] p1: maxlimit=1.397 minlimit=0.178 preferedwidth=0.254 minimp=50.000000 maximp=50.000000 favimp=50.000000
23 further rules are at their usual default settings.

## Classes and differential pairs
differential pair class EtherCAT_A_Lines: D0 D1 RD TD
net class EtherCAT_A: RD_N RD_P TD_N TD_P
differential pair class USB_Lines: GSM_USB.GSM_USB_D
net class USB: GSM_USB.GSM_USB_D_N GSM_USB.GSM_USB_D_P
differential pair class GSM_USB_Lines: GSM_USB.GSM_USB_D
differential pair class SDC_LINES: SDC
differential pair class RS485_LINES: RS485 USB.USB
net class SDC: SDC_N SDC_P
net class RS485: RS485_N RS485_P
net class GSM_USB: GSM_USB.GSM_USB_D_N GSM_USB.GSM_USB_D_P
component class U_RS485_RS232_Sheet: C40 C41 C42 C43 C44 C45 D40 D41 D42 D43 F19 F20 F21 F22 R68 R69 R70 R71 R72 R73 R74 R75 R76 R77 R78 R79 R80 R81 U8 U30
component class U_Power_Sheet: C9 C10 C11 C12 C13 C14 C15 C16 C17 C18 C19 C20 C21 C22 C23 C31 C32 C33 C34 C35 C37 C38 C39 D3 D7 IC? L1 L2 LED1 P1 P2 P4 P5 P6 P7 P10 R7 R8 R9 R10 R11 R12 R13 R14 R15 R18 R19 R21 R26 R27 U1 U2 U3 U4 U18
component class U_OLED_Sheet: C C1 C2 C3 C4 C5 C6 C7 C102 C103 C104 C105 C122 C123 C124 D26 J18 Q10 Q11 R1 R2 R117 R118 R119 R120 R121 R139 R140 R141 SB17 SW4 SW5 SW6 SW9 U20
component class U_Module_Ethernet_Sheet: C49 C76 C77 C78 C79 C109 C132 C133 FB2 J14 R51 R55 R84 R85 R86 R87 R88 R89 R144 R145 R146 T1 U12
component class U_LTE_Sheet: C80 C81 C82 C83 C84 C85 C86 C87 C88 C89 D14 D16 D17 D22 D23 D24 F3 J15 J16 J22 LED4 LED5 LED6 LED7 Q2 Q3 Q4 Q5 Q6 Q7 Q8 Q9 R58 R65 R90 R91 R92 R93 R97 R98 R99 R100 R101 R102 R103 R104 R106 R107 R108 R109 R110 R111 R112 R113 R114 R115 R116 R126 R127 R128 R129 R130 SB1 SB3 SB5 SB7 U10 U11 U14 U15
component class U_LTE_1: C90 C91 C92 C93 C94 C95 C96 C97 C98 C99 C100 C101 C110 C111 C112 C113 C115 C118 C119 C120 C121 D18 D25 FB3 FB4 J24 J25 R50 R134 R135 R136 R137 R138 R142 R143 SB2 SB4 SB6 SB8 SB9 SB11 SB13 SB15 U16 U17
component class U_GPIOs_Expander_Relay_Sheet: C36 D8 D9 D10 D11 R3 R22 R23 R24 R32 R35 R36 R37 R38 R39 R40 R41 R42 R43 R44 R45 R46 R48 U6
component class U_ESP32-C3_Sheet: ANT1 C106 C107 C108 C114 C116 C117 C125 C126 C127 C128 C129 C130 C131 J19 J20 J21 L4 L5 LED8 R122 R123 R124 R125 R131 R132 SW7 SW8 U13 U19 X2
component class U_DIAL_Sheet: C48 C50 C51 C52 C53 C54 C55 C56 C57 C58 C59 C60 C61 C62 C63 C64 C65 C66 C67 C68 C69 C70 C71 C72 C73 C74 C75 D12 D13 D15 D19 D20 D21 F4 F5 L3 Q1 R28 R29 R30 R31 R33 R47 R52 R53 R54 R56 R57 R59 R60 R61 R62 R66 R67 R82 R83 U9
component class U_Controller_Sheet: C24 C25 C26 C27 C28 C29 C30 C46 C47 D4 J11 J17 LED9 R16 R17 R20 R25 R34 R49 R94 R95 R96 R105 R133 SW1 SW2 SW3 U5 U7 X1 X3
component class U_Connector: C8 D2 F2 J1 J2 J3 J4 J5 J6 J7 J8 J9 J10 J12 J13 R4 R5 R6 R63 R64
differential pair TD: +TD_P -TD_N
differential pair RD: +RD_P -RD_N
differential pair GSM_USB.GSM_USB_D: +GSM_USB.GSM_USB_D_P -GSM_USB.GSM_USB_D_N
differential pair SDC: +SDC_P -SDC_N
differential pair RS485: +RS485_P -RS485_N

## Components (designator, comment, footprint, x,y, rotation, side; value= is the part's Value field where it differs from the comment)
ANT1 "2.4GHZ" RFANT3216120A5T 2.331,62.098 r180 top locked
C1 "100nF" CAP-0201 34.465,48.485 r90 bottom locked
C2 "4.7uF" Cap-0402 33.637,48.387 r90 bottom locked
C3 "2.2uF" CAP-0201 31.936,42.637 r90 bottom locked
C4 "4.7uF" Cap-0603 33.561,42.352 r90 bottom locked
C5 "100nF" CAP-0201 32.647,42.632 r90 bottom locked
C6 "1uF" CAP-0201 33.637,51.93 r270 bottom locked
C7 "1uF" CAP-0201 33.637,50.585 r270 bottom locked
C8 "4.7nF" Cap-1206 8.618,49.998 r180 bottom locked
C9 "0.1uf" Cap-0402 46.35,35.428 r90 bottom
C10 "0.1uf" Cap-0402 94.176,47.459 r90 top locked
C11 "10uF" Case-B 16.568,36.197 r270 bottom locked
C12 "15uF" Case-D 43.518,33.794 r270 bottom locked
C13 "0.1uf" Cap-0402 19.007,36.436 r90 bottom
C14 "470uF" Case-E 91.625,49.098 r180 top locked
C15 "100uF" Case-B 86.825,49.933 r0 bottom locked
C16 "0.1uF" Cap-0603 88.144,47.395 r180 bottom locked
C17 "100nF" Cap-0402 10.947,28.216 r0 bottom locked
C18 "4.7uF" Cap-1206 15.252,22.678 r180 bottom locked
C19 "4.7uF" Cap-1206 15.252,24.968 r180 bottom locked
C20 "47uF" Cap-1206 8.618,36.528 r90 bottom locked
C21 "6.8pF" Cap-0402 3.124,24.676 r270 bottom locked
C22 "5.1nF" Res-0603 1.829,24.968 r270 bottom
C23 "0.1uF" Cap-0603 49.411,27 r0 bottom locked
C24 "0.1uf" Cap-0402 112.42,8.324 r270 top locked
C25 "2.2uF" Cap-0603 81.605,36.361 r180 bottom
C26 "2.2uF" Cap-0603 66.385,33.437 r0 bottom
C27 "10pF" Cap-0603 70.209,58.278 r0 bottom locked
C28 "10pF" Cap-0603 74.83,55.853 r270 bottom locked
C29 "20pF" Cap-0603 66.599,58.468 r270 bottom locked
C30 "20pF" Cap-0603 68.097,58.506 r270 bottom locked
C31 "220uF" UCD-220uF-10mmDia 29.345,22.047 r270 bottom locked
C32 "220uF" UCD-220uF-10mmDia 40.013,22.047 r270 bottom locked
C33 "100uF" RVT1H101M0607 49.36,15.164 r180 bottom locked
C34 "15uF" Case-D 38.92,33.794 r270 bottom locked
C35 "0.1uf" Cap-0402 103.144,20.467 r270 bottom locked
C36 "0.1uf" Cap-0402 65.338,63.482 r90 bottom locked
C37 "470uF" Case-E 100.084,16.964 r90 bottom
C38 "100uF" Case-B 100.084,11.483 r90 bottom locked
C39 "0.1uF" Cap-0603 102.624,12.802 r270 bottom locked
C40 "0.1uf" Cap-0402 88.95,68.378 r90 bottom locked
C41 "0.1uf" Cap-0402 77.57,62.136 r270 bottom locked
C42 "0.1uf" Cap-0402 68.731,66.111 r90 bottom locked
C43 "0.1uf" Cap-0402 68.731,63.571 r90 bottom locked
C44 "0.1uf" Cap-0402 68.731,68.321 r270 bottom locked
C45 "0.1uf" Cap-0402 73.284,60.231 r180 bottom locked
C46 "1uF" CAP-0201 60.087,56.347 r180 bottom locked
C47 "0.1uf" Cap-0402 60.019,55.458 r180 bottom locked
C48 "10nF" Cap-0402 31.062,67.977 r90 bottom locked
C49 "1uF" Cap-0603 79.636,25.554 r180 bottom
C50 "10nF" Cap-0402 30.062,67.976 r90 bottom locked
C51 "100nF" CAP-0201 40.106,64.151 r0 bottom locked
C52 "10nF" Cap-0402 39.936,63.292 r0 bottom locked
C53 "180pF" CAP-0201 42.271,65.556 r180 bottom locked
C54 "0.1uF" Cap-0402 28.857,67.976 r90 bottom locked
C55 "0.1uF" Cap-0603 43.946,60.491 r180 top locked
C56 "0.1uF" Cap-0603 43.946,59.247 r180 top locked
C57 "33nF" Cap-0805 43.692,66.122 r180 top locked
C58 "0.1uF" Cap-0805 38.368,59.122 r0 top locked
C59 "0.1uF" Cap-0805 48.671,66.121 r0 top locked
C60 "10nF" Cap-0402 24.143,62.437 r0 bottom locked
C61 "10nF" Cap-0402 24.143,63.437 r0 bottom locked
C62 "5.6pF" Cap-0402 36.514,63.624 r180 bottom locked
C63 "5.6pF" Cap-0402 36.514,62.243 r180 bottom locked
C64 "33nF" Cap-0805 47.855,60.187 r180 top locked
C65 "47nF" Cap-0402 25.839,57.244 r90 bottom locked
C66 "100nF" CAP-0201 33.09,57.893 r180 bottom locked
C67 "10pF" Cap-0402 30.611,57.447 r0 bottom locked
C68 "100nF" CAP-0201 28.415,57.09 r90 bottom locked
C69 "10nF" Cap-0805 20.391,62.89 r270 bottom locked
C70 "100nF" CAP-0201 23.823,58.443 r0 bottom locked
C71 "10nF" Cap-0402 23.686,59.281 r0 bottom locked
C72 "100nF" CAP-0201 29.05,57.09 r90 bottom locked
C73 "100nF" CAP-0201 36.177,60.908 r270 bottom locked
C74 "100nF" CAP-0201 26.758,66.257 r0 bottom locked
C75 "0.1uF" Cap-0805 38.337,64.069 r0 top locked
C76 "100nF" CAP-0201 79.343,23.896 r180 bottom
C77 "100nF" CAP-0201 79.343,24.518 r180 bottom
C78 "0.01uF" Cap-0402 82.617,15.519 r0 bottom
C79 "0.01uF" Cap-0402 82.617,26.487 r0 bottom
C80 "100nF" CAP-0201 86.387,75.767 r270 top locked
C81 "100nF" CAP-0201 85.587,75.766 r270 top locked
C82 "100nF" CAP-0201 112.917,49.867 r90 top locked
C83 "100nF" CAP-0201 113.514,49.868 r90 top locked
C84 "100nF" CAP-0201 102.119,41.839 r0 bottom
C85 "100nF" CAP-0201 102.119,27.738 r0 bottom locked
C86 "100nF" CAP-0201 115.021,69.245 r180 bottom locked
C87 "100nF" CAP-0201 99.085,78.1 r270 bottom locked
C88 "100nF" CAP-0201 115.865,52.681 r180 bottom locked
C89 "100nF" CAP-0201 95.328,79.94 r0 bottom locked
C90 "100nF" CAP-0201 100.858,77.8 r0 top locked
C91 "100nF" CAP-0201 100.858,78.43 r0 top locked
C92 "100nF" CAP-0201 100.858,79.061 r0 top locked
C93 "100nF" CAP-0201 100.858,79.692 r0 top locked
C94 "220uF" Case-D 98.555,85.118 r90 top locked
C95 "100nF" CAP-0201 114.626,62.634 r90 bottom locked
C96 "100nF" CAP-0201 115.257,62.634 r90 bottom locked
C97 "100nF" CAP-0201 115.887,62.634 r90 bottom locked
C98 "100nF" CAP-0201 116.518,62.634 r90 bottom locked
C99 "220uF" Case-D 115.194,62.521 r270 top locked
C100 "100nF" CAP-0201 114.952,57.481 r180 bottom locked
C101 "100nF" CAP-0201 96.416,78.1 r270 bottom locked
C102 "1uF" CAP-0201 32.697,47.587 r270 bottom locked
C103 "100nF" Cap-0201 48.504,34.321 r0 top
C104 "100nF" Cap-0201 58.791,34.27 r0 top
C105 "100nF" Cap-0201 69.104,34.27 r0 top locked
C106 "1uF" CAP-0201 6.954,64.744 r0 top locked
C107 "1.3pF" CAP-0201 6.477,61.798 r90 top locked
C108 "1.3pF" CAP-0201 8.477,61.798 r90 top locked
C109 "1000pF" Cap-1206 96.571,23.913 r270 bottom
C110 "22PF" Cap-0402 93.256,57.231 r180 bottom locked value=22pF
C111 "22PF" Cap-0402 93.256,59.939 r180 bottom locked value=22pF
C112 "22PF" Cap-0402 93.256,58.585 r180 bottom locked value=22pF
C113 "22PF" Cap-0402 95.608,56.719 r90 top locked value=22pF
C114 "0.1uF" Cap-0402 3.387,54.483 r270 top locked
C115 "22PF" Cap-0402 98.428,56.719 r90 top locked value=22pF
C116 "20pF" Cap-0603 12.54,69.314 r270 top locked
C117 "20pF" Cap-0603 18.254,69.49 r90 top locked
C118 "22PF" Cap-0402 97.014,56.719 r90 top locked value=22pF
C119 "22PF" Cap-0402 94.009,70.536 r270 bottom locked value=22pF
C120 "22PF" Cap-0402 95.219,70.536 r270 bottom locked value=22pF
C121 "22PF" Cap-0402 93.256,52.231 r0 bottom locked value=22pF
C122 "100nF" Cap-0201 104.389,9.326 r90 top locked
C123 "1uF" CAP-0201 30.898,54.29 r0 bottom
C124 "1uF" CAP-0201 29.362,54.29 r180 bottom
C125 "0.1uF" Cap-0402 6.871,63.874 r180 top locked
C126 "1uF" CAP-0201 11.688,59.766 r270 top locked
C127 "0.1uF" Cap-0402 8.526,59.596 r270 top locked
C128 "10uF" Cap-0402 7.404,59.596 r90 top locked
C129 "0.1uF" Cap-0402 15.092,57.7 r90 top locked
C130 "1uF" CAP-0201 13.392,66.225 r270 top locked
C131 "10uF" Cap-0402 12.54,66.055 r90 top locked
C132 "1000pF" Cap-1206 93.599,15.494 r270 top
C133 "4.7nF" Cap-1206 97.307,15.494 r270 top
D2 "SMBJ36CA" SMB_ 13.974,15.85 r180 bottom locked
D3 "SL10100" TO-277 5.799,29.871 r270 bottom locked
D4 "UDD32C03L01" SOD-323 7.404,58.898 r270 bottom locked
D7 "B340A" SMA(DO-214AC) 49.931,30.018 r180 bottom
D8 "BZX84C3V3TS-7-F" SOT-363 26.017,12.454 r270 bottom locked
D9 "BZX84C3V3TS-7-F" SOT-363 56.497,12.497 r270 bottom locked
D10 "BZX84C3V3TS-7-F" SOT-363 41.257,12.5 r270 bottom locked
D11 "BZX84C3V3TS-7-F" SOT-363 71.737,12.501 r270 bottom locked
D12 "LBAS21HT1G" SOD-323 27.484,68.657 r270 bottom locked
D13 "BAV70" SOT-23 41.747,63.251 r0 top locked
D14 "PESD5V0H1BSFYL" DSN0603-2 117.007,72.968 r90 top locked
D15 "BAV70" SOT-23 45.658,63.251 r180 top locked
D16 "PESD5V0H1BSFYL" DSN0603-2 114.919,68.624 r0 bottom locked
D17 "PESD5V0H1BSFYL" DSN0603-2 115.765,53.431 r0 bottom locked
D18 "MMSZ5231BT1G" SOD-123 118.519,60.558 r90 top locked
D19 "BAV70" SOT-23 49.687,63.251 r0 top locked
D20 "BAV70" SOT-23 53.69,63.251 r180 top locked
D21 "TISP61089BDR-S" "SOIC-8(0.154\", 3.90mm Width)" 16.88,68.105 r270 bottom locked value=100pF
D22 "PESD5V0H1BSFYL" DSN0603-2 99.746,78.095 r90 bottom locked
D23 "PESD5V0H1BSFYL" DSN0603-2 95.403,80.622 r180 bottom locked
D24 "ESD5302F-3/TR" Sot-23 115.049,77.833 r0 top locked
D25 "MMSZ5231BT1G" SOD-123 95.232,87.32 r270 top locked
D26 "1SS355WT" SOD-523 30.504,47.587 r90 bottom locked
D40 "SMBJ26CA" "SMB Bi Directional" 89.457,76.752 r270 bottom locked
D41 "SMBJ26CA" "SMB Bi Directional" 81.431,76.752 r270 bottom locked
D42 "SMBJ26CA" "SMB Bi Directional" 68.731,76.752 r270 bottom locked
D43 "SMBJ26CA" "SMB Bi Directional" 76.757,76.752 r270 bottom locked
F2 "SHV2920P500-30-AA" Fuse-2920 13.47,10.82 r180 bottom locked
F3 "SMD0603-050" Fuse-0603 115.149,73.582 r0 top locked
F4 "JK250-080U" JK250-080U 14.843,78.481 r270 bottom
F5 "JK250-080U" JK250-080U 18.907,78.481 r270 bottom
F19 "SMD0805P020TF" Fuse-0805 71.702,75.552 r270 bottom locked
F20 "SMD0805P020TF" Fuse-0805 86.485,75.547 r90 bottom locked
F21 "SMD0805P020TF" Fuse-0805 84.402,75.547 r90 bottom locked
F22 "SMD0805P020TF" Fuse-0805 73.785,75.547 r270 bottom locked
FB2 "100MHz" Ind-0805 77.836,27.147 r180 bottom value=15mR
FB3 "100MHz" Ind-0805 118.519,65.257 r270 top locked value=15mR
FB4 "100MHz" Ind-0805 95.232,82.744 r90 top locked value=15mR
J1 "DB128L-5.08-3P-BK-S" DB128L-5.08-3P-BK-S 29.575,84.92 r180 top locked
J2 "DB128L-5.08-3P-BK-S" DB128L-5.08-3P-BK-S 44.815,84.92 r180 top locked
J3 "MC-318FB" MC-318FB 3.322,46.442 r270 top locked
J4 "DB128L-5.08-3P-BK-S" DB128L-5.08-3P-BK-S 26.017,5.08 r0 top locked
J5 "DB128L-5.08-2P-BK-S" DB128L-5.08-2P-BK-S 13.317,5.08 r0 top locked
J6 "DB128L-5.08-3P-BK-S" DB128L-5.08-3P-BK-S 41.257,5.08 r0 top locked
J7 "DB128L-5.08-3P-BK-S" DB128L-5.08-3P-BK-S 60.055,84.92 r180 top locked
J8 "DB128L-5.08-3P-BK-S" DB128L-5.08-3P-BK-S 56.497,5.08 r0 top locked
J9 "DB128L-5.08-3P-BK-S" DB128L-5.08-3P-BK-S 71.737,5.08 r0 top locked
J10 "DB128L-5.08-2P-BK-S" DB128L-5.08-2P-BK-S 87.995,84.92 r180 top locked
J11 "HX20012-6A black" "HX20012-6A BLACK" 101.1,5.235 r90 top locked
J12 "DB128L-5.08-2P-BK-S" DB128L-5.08-2P-BK-S 16.875,84.92 r180 top locked
J13 "DB128L-5.08-3P-BK-S" DB128L-5.08-3P-BK-S 75.295,84.92 r180 top locked
J14 "RC01835" RC01835 88.578,8.982 r180 top locked
J15 "XKNANO-113" XKNANO-113 112.048,42.429 r270 bottom locked
J16 "XKNANO-113" XKNANO-113 112.048,28.303 r270 bottom locked
J17 "JTAG" "POGO 6 Pin" 48.039,51.471 r270 bottom locked
J18 "AFC01-S15FCC-00" AFC01-S15FCC-00 37.269,48.285 r270 bottom locked
J19 "POGO Connector 6 Pin" "POGO 6 Pin" 52.662,48.971 r90 bottom locked
J20 "BWMMCX-KWE" BWMMCX-KWE 9.152,87.477 r180 top locked
J21 "Voltlink Target" "Voltlink Target" 13.665,53.086 r90 bottom
J22 "POGO Connector 4 Pin" "Pogo 4 Pin" 118.683,77.283 r90 top locked
J24 "BWMMCX-KWE" BWMMCX-KWE 110.701,87.452 r180 top locked
J25 "BWMMCX-KWE" BWMMCX-KWE 106.002,87.452 r180 top locked
L1 "5.6uH" FXL0630-5R6-M 3.824,36.528 r90 bottom locked
L2 "100uH" TMPA1265SP-101MN-D 60.282,24.423 r270 bottom locked
L3 "15uH" VLS6045AF-150M 44.071,61.796 r180 bottom locked
L4 "6.8nH" IND-0201 7.472,62.109 r0 top locked
L5 "2nH" "IND-0603 (1608 Metric)" 10.217,60.066 r180 top locked
LED1 "RED" LED-0603 13.495,47.06 r0 top locked
LED4 "Emerald" LED-0603 9.629,41.046 r0 top locked
LED5 "Yellow" LED-0603 13.495,41.046 r0 top locked
LED6 "Yellow" LED-0603 13.495,39.041 r0 top locked
LED7 "Emerald" LED-0603 9.629,39.041 r0 top locked
LED8 "Emerald" LED-0603 13.495,43.051 r0 top locked
LED9 "Blue" LED-0603 13.495,45.055 r0 top locked
P1 "TEST POINT" Test-point 13.393,27.819 r90 top locked
P2 "TEST POINT" Test-point 13.393,30.107 r90 top locked
P4 "TEST POINT" Test-point 13.393,32.396 r90 top locked
P5 "TEST POINT" Test-point 13.393,25.531 r90 top locked
P6 "TEST POINT" Test-point 13.393,23.242 r90 top locked
P7 "TEST POINT" Test-point 13.393,20.954 r90 top locked
P10 "TEST POINT" Test-point 13.393,18.666 r180 top locked
Q1 "NTR5198NLT1G" SOT-23 52.69,59.567 r90 top locked
Q2 "FDN335N" SOT-23 80.467,73.288 r180 top locked
Q3 "FDN335N" SOT-23 106.013,54.004 r180 top locked
Q4 "FDN335N" SOT-23 77.1,73.039 r270 top locked
Q5 "FDN335N" SOT-23 117.422,55.148 r270 bottom locked
Q6 "MMBT3904M" SOT-723 115.296,70.383 r270 bottom locked
Q7 "MMBT3904M" SOT-723 97.866,78.4 r0 bottom locked
Q8 "MMBT3904M" SOT-723 116.14,51.381 r270 bottom locked
Q9 "MMBT3904M" SOT-723 95.053,78.797 r90 bottom locked
Q10 "FDN338P" SOT-23 23.248,50.683 r90 bottom locked
Q11 "FDN335N" SOT-23 22.248,47.371 r180 bottom locked
R1 "47K" Res-0603 20.835,50.683 r270 bottom locked
R2 "47K" Res-0603 22.248,44.958 r0 bottom locked
R3 "G6K-2F-Y-TR-DC5" "G6K-2F-Y-TR DC5" 29.315,76.962 r0 bottom locked
R4 "5.1K" Res-0402 7.589,47.966 r0 top locked
R5 "1M" Res-0603 8.11,48.237 r180 bottom locked
R6 "5.1K" Res-0402 7.589,44.842 r0 top locked
R7 "60.4K" Res-0402 4.435,20.164 r180 bottom locked
R8 "23.2K" Res-0402 2.425,23.186 r0 bottom locked
R9 "11.5K" Res-0402 4.435,21.409 r0 bottom locked
R10 "1K" Res-0201 13.495,47.06 r180 bottom locked value=1kR
R11 "100K" Res-0201 94.595,43.861 r90 bottom locked
R12 "470R" Res-0201 94.176,50.108 r270 top locked
R13 "10K" Res-0201 83.749,43.334 r90 bottom locked
R14 "47K" Res-0402 94.596,42.296 r90 bottom locked
R15 "169K" Res-0402 10.185,21.409 r0 bottom locked
R16 "10K" Res-0201 109.266,21.102 r90 top locked
R17 "10K" Res-0201 109.266,30.657 r90 top locked
R18 "10K" Res-0201 47.506,26.919 r90 bottom locked
R19 "100K" Res-0201 105.396,19.298 r180 bottom locked
R20 "DNP" Res-0402 69.653,33.221 r90 bottom locked
R21 "470R" Res-0201 104.084,20.442 r270 bottom locked
R22 "100K" YC164-JR-070RL 79.399,55.053 r0 bottom locked
R23 "100K" YC164-JR-070RL 73.976,31.252 r270 bottom locked
R24 "100K" YC164-JR-070RL 58.573,42.329 r180 bottom locked
R25 "DNP" Res-0402 68.653,33.221 r90 bottom locked
R26 "10K" Res-0201 105.946,8.407 r180 bottom locked
R27 "47K" Res-0402 106.904,19.298 r180 bottom locked
R28 "15R" Res-0603 38.324,60.842 r180 top locked
R29 "15R" Res-0603 45.409,65.556 r180 bottom locked
R30 "1.65M" RES-0805 29.915,58.847 r0 top locked
R31 "110K" Res-0603 23.787,68.264 r180 bottom locked
R32 "G6K-2F-Y-TR-DC5" "G6K-2F-Y-TR DC5" 59.795,76.962 r0 bottom locked
R33 "110K" Res-0603 23.787,66.911 r180 bottom locked
R34 "10K" Res-0201 113.665,10.338 r180 top locked
R35 "4.7K" Res-0402 24.925,9.719 r270 bottom locked
R36 "4.7K" Res-0402 55.405,9.716 r270 bottom locked
R37 "4.7K" Res-0402 26.017,9.719 r270 bottom locked
R38 "4.7K" Res-0402 56.497,9.716 r270 bottom locked
R39 "4.7K" Res-0402 27.109,9.719 r270 bottom locked
R40 "4.7K" Res-0402 57.589,9.716 r270 bottom locked
R41 "4.7K" Res-0402 40.165,9.719 r270 bottom locked
R42 "4.7K" Res-0402 70.645,9.719 r270 bottom locked
R43 "4.7K" Res-0402 41.257,9.719 r270 bottom locked
R44 "4.7K" Res-0402 71.737,9.719 r270 bottom locked
R45 "4.7K" Res-0402 42.349,9.719 r270 bottom locked
R46 "4.7K" Res-0402 72.829,9.719 r270 bottom locked
R47 "681K" Res-0603 23.787,65.405 r180 bottom locked value=681kR
R48 "G6K-2F-Y-TR-DC5" "G6K-2F-Y-TR DC5" 44.789,76.962 r0 bottom locked
R49 "2.2K" Res-0603 113.665,8.616 r90 top locked value=2.2kR
R50 "DNP" Res-0402 102.192,70.742 r270 bottom locked
R51 "10K" Res-0201 77.696,25.604 r270 bottom
R52 "10K" Res-0201 35.25,60.908 r90 bottom locked
R53 "681K" Res-0603 23.787,60.376 r180 bottom locked value=681kR
R54 "49.9K" Res-0402 24.806,57.26 r90 bottom locked value=49.9kR
R55 "6.49K" Res-0603 78.662,17.715 r180 bottom locked value=6.49kR
R56 "68K" RES-0603 55.952,58.617 r180 top locked
R57 "0R" Res-0603 59.198,62.851 r180 top locked
R58 "47K" Res-0201 102.144,41.082 r180 bottom value=47kR
R59 "10K" Res-0201 27.755,57.09 r90 bottom locked
R60 "0.2R" Res-1206 56.727,61.581 r90 top locked value=200mR
R61 "0R" Res-0603 59.198,60.311 r180 top locked
R62 "1.47M" Res-1206 11.809,77.211 r270 bottom
R63 "0R" Res-0402 7.589,45.9 r180 top locked
R64 "0R" Res-0402 7.589,46.9 r180 top locked
R65 "47K" Res-0201 102.12,26.966 r180 bottom locked value=47kR
R66 "15R" Res-0603 21.153,60.376 r0 bottom locked
R67 "15R" Res-0603 21.153,65.405 r0 bottom locked
R68 "4.7K" Res-0402 87.476,61.259 r270 bottom locked
R69 "4.7K" Res-0402 86.206,61.259 r270 bottom locked
R70 "4.7K" Res-0402 84.936,61.259 r270 bottom locked
R71 "4.7K" Res-0402 83.666,61.259 r270 bottom locked
R72 "4.7K" Res-0402 86.803,71.864 r180 bottom locked
R73 "22R" Res-0201 69.006,71.864 r0 bottom locked
R74 "22R" Res-0201 89.182,71.864 r0 bottom locked
R75 "22R" Res-0201 81.706,71.864 r180 bottom locked
R76 "22R" Res-0201 76.482,71.864 r180 bottom locked
R77 "4.7K" Res-0402 84.326,71.864 r180 bottom locked
R78 "120R" Res-0603 85.571,70.34 r180 bottom locked
R79 "0R" Res-0402 88.895,61.729 r180 bottom locked
R80 "0R" Res-0402 81.3,61.729 r0 bottom locked
R81 "0R" Res-0402 81.3,63.348 r180 bottom locked
R82 "1.47M" Res-1206 22.311,72.935 r90 bottom
R83 "0R" Res-0603 38.337,62.251 r0 top locked
R84 "330R" Res-0603 95.613,14.605 r270 top locked
R85 "330R" Res-0603 81.467,14.605 r270 top locked
R86 "75R" Res-0603 84.246,14.224 r0 top
R87 "75R" Res-0603 88.326,14.224 r0 top
R88 "75R" Res-0603 94.793,18.579 r270 bottom
R89 "75R" Res-0603 94.793,23.405 r90 bottom
R90 "180R" Res-0201 13.52,39.041 r0 bottom locked
R91 "180R" Res-0201 13.495,41.138 r0 bottom locked
R92 "1K" Res-0603 83.084,75.05 r270 top value=1kR
R93 "1K" Res-0603 108.756,54.242 r90 top locked value=1kR
R94 "10K" Res-0201 63.979,51.948 r0 bottom locked
R95 "10K" Res-0201 63.979,52.648 r0 bottom locked
R96 "10K" Res-0201 63.979,53.348 r0 bottom locked
R97 "10K" Res-0201 80.467,75.397 r0 top locked
R98 "10K" Res-0201 106.013,56.175 r0 top locked
R99 "180R" Res-0201 10.434,38.522 r90 bottom
R100 "180R" Res-0201 9.558,41.262 r0 bottom
R101 "1K" Res-0603 76.862,75.706 r180 top locked value=1kR
R102 "1K" Res-0603 117.609,57.764 r0 bottom locked value=1kR
R103 "10K" Res-0201 75.159,73.039 r90 top locked
R104 "10K" Res-0201 119.384,55.148 r90 bottom locked
R105 "100R" Res-0402 13.495,45.046 r180 bottom locked
R106 "22R" Res-0201 99.53,42.799 r180 bottom locked
R107 "4.7K" Res-0603 118.36,70.021 r270 bottom locked
R108 "47K" Res-0603 117.04,70.021 r90 bottom locked
R109 "4.7K" Res-0603 97.853,81.455 r0 bottom locked
R110 "47K" Res-0603 97.866,80.127 r180 bottom locked
R111 "22R" Res-0201 99.53,44.099 r180 bottom locked
R112 "22R" Res-0201 103.208,45.58 r270 bottom locked
R113 "4.7K" Res-0603 119.019,51.381 r270 bottom locked
R114 "47K" Res-0603 117.724,51.381 r90 bottom locked
R115 "4.7K" Res-0603 92.127,78.797 r90 bottom locked
R116 "47K" Res-0603 93.397,78.797 r270 bottom locked
R117 "4.7K" Res-0402 31.618,47.587 r90 bottom locked value=4.7kR
R118 "10K" Res-0603 30.792,45.801 r0 bottom locked value=10kR
R119 "0R" Res-0402 33.167,45.801 r0 bottom locked
R120 "10K" Res-0201 30.839,44.453 r0 bottom locked
R121 "560K" Res-0402 31.021,42.482 r90 bottom locked
R122 "10K" Res-0201 7.722,65.585 r0 top locked
R123 "10K" Res-0201 4.251,54.483 r270 top locked
R124 "10K" Res-0201 8.618,54.483 r270 top locked
R125 "100R" Res-0402 13.495,43.083 r0 bottom locked
R126 "22R" Res-0201 103.208,41.357 r270 bottom locked
R127 "22R" Res-0201 99.53,28.673 r180 bottom locked
R128 "22R" Res-0201 99.512,30.653 r180 bottom
R129 "22R" Res-0201 103.21,31.453 r270 bottom locked
R130 "22R" Res-0201 103.208,27.241 r270 bottom locked
R131 "10K" Res-0201 12.376,59.583 r90 bottom locked
R132 "10K" Res-0201 16.592,58.444 r90 top locked
R133 "10K" Res-0201 105.159,9.351 r270 top locked
R134 "DNP" Res-0402 109.81,62.714 r180 top locked
R135 "DNP" Res-0402 101.18,70.742 r270 bottom locked
R136 "DNP" Res-0402 109.81,61.683 r180 top locked
R137 "DNP" Res-0402 113.164,70.827 r90 bottom locked
R138 "DNP" Res-0402 112.174,70.827 r90 bottom locked
R139 "10K" Res-0201 32.544,51.555 r90 bottom
R140 "560K" Res-0402 26.937,52.471 r180 bottom
R141 "200K" Res-0402 27.407,50.94 r270 bottom
R142 "DNP" Res-0402 100.008,70.742 r270 bottom
R143 "DNP" Res-0402 109.81,63.731 r180 top
R144 "2.49K" Res-0603 70.805,24.314 r0 bottom value=2.49kR
R145 "2.49K" Res-0603 70.805,25.744 r0 bottom value=2.49kR
R146 "1M" Res-0402 99.085,14.16 r270 top
SB1 "Solder Bridge 0603" "Solder Bridge" 85.479,64.625 r180 top locked
SB2 "Solder Bridge 0603" "Solder Bridge" 85.479,59.491 r180 top locked
SB3 "Solder Bridge 0603" "Solder Bridge" 85.479,63.228 r180 top locked
SB4 "Solder Bridge 0603" "Solder Bridge" 85.479,58.085 r180 top locked
SB5 "Solder Bridge 0603" "Solder Bridge" 85.479,66.144 r180 top locked
SB6 "Solder Bridge 0603" "Solder Bridge" 85.479,55.275 r180 top locked
SB7 "Solder Bridge 0603" "Solder Bridge" 85.479,67.643 r180 top locked
SB8 "Solder Bridge 0603" "Solder Bridge" 85.479,56.68 r180 top locked
SB9 "Solder Bridge 0603" "Solder Bridge" 92.994,51.023 r180 bottom locked
SB11 "Solder Bridge 0603" "Solder Bridge" 92.963,53.431 r180 bottom locked
SB13 "Solder Bridge 0603" "Solder Bridge" 96.416,71.018 r90 bottom locked
SB15 "Solder Bridge 0603" "Solder Bridge" 92.779,71.018 r90 bottom locked
SB17 "Solder Bridge 0603" "Solder Bridge" 32.875,44.453 r180 bottom locked
SW1 "SS-3235D-03-L2" SS-3235D-03-L2_ 113.116,21.009 r270 top locked
SW2 "SS-3235D-03-L2" SS-3235D-03-L2_ 113.131,30.803 r270 top locked
SW3 "B3U-1000P" B3U-1000P 116.612,8.616 r0 top locked
SW4 "K2-1102SP-C4SC-04" K2-1102SP-C4SC-04 53.106,37.732 r180 top
SW5 "K2-1102SP-C4SC-04" K2-1102SP-C4SC-04 63.419,37.732 r180 top locked
SW6 "K2-1102SP-C4SC-04" K2-1102SP-C4SC-04 73.732,37.732 r180 top locked
SW7 "B3U-1000P" B3U-1000P 1.432,54.483 r270 top locked
SW8 "B3U-1000P" B3U-1000P 6.662,54.483 r270 top locked
SW9 "K2-1102SP-C4SC-04" K2-1102SP-C4SC-04 108.622,5.451 r90 top locked
T1 "H1102NL" H1102NLT 88.731,20.992 r0 bottom locked value=350uH
U1 "LM2594M-12" SOP-8 49.411,22.555 r90 bottom locked
U2 "MIC29302WU-TR" "TO-263-5 (D2PAK)" 89.007,39.014 r0 bottom locked
U3 "LM1084S-3.3/TR" TO263-3_ 26.551,35.23 r90 bottom locked
U4 "MIC29302WU-TR" "TO-263-5 (D2PAK)" 110.244,13.564 r90 bottom locked
U5 "W25Q128JVSIQ" "SOIC-8 (208 mil)" 58.573,50.287 r90 bottom locked
U6 "ULN2003A" SOP-16_150mil 59.369,65.888 r270 bottom locked
U7 "STM32F407VET6" LQFP-100 72.249,43.901 r270 bottom locked
U8 "SP3485EIM/TR" SOP-8 85.571,66.098 r90 bottom locked
U9 "SI32185-A-GM" "40-QFN (6x6)" 30.015,62.433 r180 bottom locked
U10 "TXB0102DCUT" TXB0102DCUT 85.987,72.749 r90 top locked
U11 "TXB0102DCUT" TXB0102DCUT 113.216,52.858 r270 top locked
U12 "DP83825IRMQR" "24-WQFN (3x3)" 77.4,20.855 r270 bottom locked
U13 "SKY13489-001" WLCSP-6(0.7X1.1) 8.951,64.274 r270 top locked
U14 "SMF05CT1G-ES" SOT-363 102.238,43.449 r0 bottom locked
U15 "SMF05CT1G-ES" SOT-363 102.238,29.323 r0 bottom locked
U16 "A7682E" A7682E 104.364,59.681 r90 bottom locked
U17 "A7682E" A7682E 98.108,67.512 r0 top locked
U18 "TPS54540BDDAR" "8-SO PowerPad" 7.78,24.841 r180 bottom locked
U19 "ESP32-C3FH4" "32-QFN (5x5)" 15.842,62.521 r0 top locked
U20 "UM1750S-00" SOT-23-5 30.141,52.23 r180 bottom
U30 "MAX3232ESE" SOP-16 73.284,65.946 r0 bottom locked
X1 "24MHZ" X322524MOB4SI- 72.071,55.941 r0 bottom locked
X2 "40MHz" X322540MPB4SI_ 15.551,69.402 r0 top locked value=40MHZ
X3 "32.768kHz" SMD2012-2P 67.349,55.941 r0 bottom locked

## Footprints (in the part's own frame and the unit in brackets; to place one, negate y for a bottom-side part, rotate by r counter-clockwise, add the part's x,y. Pads: shape width x height; smd on the part's side, far side on the other; paste and mask are expansions set on the pad)
"8-SO PowerPad" [mm]
  rect 2.2x0.5 smd mask+0.07: 1(-2.875,1.905) 2(-2.875,0.635) 3(-2.875,-0.635) 4(-2.875,-1.905) 5(2.875,-1.905) 6(2.875,-0.635) 7(2.875,0.635) 8(2.875,1.905)
  rect 2.4x3.1 smd mask+0.07: 9(0,0)
  silkscreen extent -4.24,-2.49 1.73,2.49, body extent -3,-2.45 3,2.45, height 1.7
"24-WQFN (3x3)" [mm]
  rect 0.45x0.2 smd mask+0: 1(-1.475,0.9) 2(-1.475,0.5) 4(-1.475,-0.5) 5(-1.475,-0.9) 13(1.475,-0.9) 14(1.475,-0.5) 16(1.475,0.5) 17(1.475,0.9)
  rect 0.45x0.4 smd mask+0: 3(-1.475,0) 15(1.475,0)
  rect 0.25x0.25 smd mask+0: 6(-1.325,-1.325) 12(1.325,-1.325) 18(1.325,1.325) 24(-1.325,1.325)
  rect 0.2x0.45 smd mask+0: 7(-0.9,-1.475) 8(-0.5,-1.475) 10(0.5,-1.475) 11(0.9,-1.475) 19(0.9,1.475) 20(0.5,1.475) 22(-0.5,1.475) 23(-0.9,1.475)
  rect 0.4x0.45 smd mask+0: 9(0,-1.475) 21(0,1.475)
  rect 1.9x1.9 smd paste-2 mask+0: 25(0,0)
  round 0.4 hole 0.2 mask+0: 26(-0.7,0.7) 27(0.7,0.7) 28(0,0) 29(-0.7,-0.7) 30(0.7,-0.7)
  silkscreen extent -1.94,-1.64 1.67,1.64, body extent -1.5,-1.5 1.5,1.5, height 0.8
"32-QFN (5x5)" [mm] "32pins, 5x5mm body, 0.5mm pitch QFN package"
  rect 0.7x0.28 smd: 1(-2.45,1.75) 2(-2.45,1.25) 3(-2.45,0.75) 4(-2.45,0.25) 5(-2.45,-0.25) 6(-2.45,-0.75) 7(-2.45,-1.25) 8(-2.45,-1.75) 17(2.45,-1.75) 18(2.45,-1.25) 19(2.45,-0.75) 20(2.45,-0.25) 21(2.45,0.25) 22(2.45,0.75) 23(2.45,1.25) 24(2.45,1.75)
  rect 0.28x0.7 smd: 9(-1.75,-2.45) 10(-1.25,-2.45) 11(-0.75,-2.45) 12(-0.25,-2.45) 13(0.25,-2.45) 14(0.75,-2.45) 15(1.25,-2.45) 16(1.75,-2.45) 25(1.75,2.45) 26(1.25,2.45) 27(0.75,2.45) 28(0.25,2.45) 29(-0.25,2.45) 30(-0.75,2.45) 31(-1.25,2.45) 32(-1.75,2.45)
  rect 3.254x3.254 smd: 33(0,0)
  silkscreen extent -3.07,-2.57 2.57,2.57, body extent -2.5,-2.5 2.5,2.5, height 0.85
"40-QFN (6x6)" [mm]
  rect 0.85x0.3 smd: 1(-2.95,2.25) 2(-2.95,1.75) 3(-2.95,1.25) 4(-2.95,0.75) 5(-2.95,0.25) 6(-2.95,-0.25) 7(-2.95,-0.75) 8(-2.95,-1.25) 9(-2.95,-1.75) 10(-2.95,-2.25) 21(2.95,-2.25) 22(2.95,-1.75) 23(2.95,-1.25) 24(2.95,-0.75) 25(2.95,-0.25) 26(2.95,0.25) 27(2.95,0.75) 28(2.95,1.25) 29(2.95,1.75) 30(2.95,2.25)
  rect 0.3x0.85 smd: 11(-2.25,-2.95) 12(-1.75,-2.95) 13(-1.25,-2.95) 14(-0.75,-2.95) 15(-0.25,-2.95) 16(0.25,-2.95) 17(0.75,-2.95) 18(1.25,-2.95) 19(1.75,-2.95) 20(2.25,-2.95) 31(2.25,2.95) 32(1.75,2.95) 33(1.25,2.95) 34(0.75,2.95) 35(0.25,2.95) 36(-0.25,2.95) 37(-0.75,2.95) 38(-1.25,2.95) 39(-1.75,2.95) 40(-2.25,2.95)
  rect 3.5x4.6 smd: 41(0,0)
  silkscreen extent -3.73,-3.05 3.05,3.05, body extent -3,-3 3,3, height 1
A7682E [mm]
  rect 0.9x0.7 smd paste-1: 1(-7.85,6.05) 2(-7.85,4.95) 3(-7.85,3.85) 4(-7.85,2.75) 5(-7.85,1.65) 6(-7.85,0.55) 7(-7.85,-0.55) 8(-7.85,-1.65) 9(-7.85,-2.75) 10(-7.85,-3.85) 11(-7.85,-4.95) 12(-7.85,-6.05) 22(7.85,-6.05) 23(7.85,-4.95) 24(7.85,-3.85) 25(7.85,-2.75) 26(7.85,-1.65) 27(7.85,-0.55) 28(7.85,0.55) 29(7.85,1.65) 30(7.85,2.75) 31(7.85,3.85) 32(7.85,4.95) 33(7.85,6.05)
  rect 0.7x0.9 smd paste-1: 13(-4.4,-8.8) 14(-3.3,-8.8) 15(-2.2,-8.8) 16(-1.1,-8.8) 17(0,-8.8) 18(1.1,-8.8) 19(2.2,-8.8) 20(3.3,-8.8) 21(4.4,-8.8) 34(4.4,8.8) 35(3.3,8.8) 36(2.2,8.8) 37(1.1,8.8) 38(0,8.8) 39(-1.1,8.8) 40(-2.2,8.8) 41(-3.3,8.8) 42(-4.4,8.8) 78(-6.6,-8.8) 79(-5.5,-8.8) 80(6.6,-8.8) 81(5.5,-8.8) 82(6.6,8.8) 83(5.5,8.8) 84(-5.5,8.8) 85(-6.6,8.8)
  rect 1.1x0.9 smd paste-2: 43(-5.35,4.9) 44(-5.35,3.5) 45(-5.35,2.1) 46(-5.35,0.7) 47(-5.35,-0.7) 48(-5.35,-2.1) 49(-5.35,-3.5) 50(-5.35,-4.9) 58(5.35,-4.9) 59(5.35,-3.5) 60(5.35,-2.1) 61(5.35,-0.7) 62(5.35,0.7)
  rect 0.9x1.1 smd paste-2: 51(-4.2,-6.3) 52(-2.8,-6.3) 53(-1.4,-6.3) 54(0,-6.3) 55(1.4,-6.3) 56(2.8,-6.3) 57(4.2,-6.3) 63(2.8,6.3) 64(1.4,6.3) 65(0,6.3) 66(-1.4,6.3) 67(-2.8,6.3) 68(-4.2,6.3)
  rect 1.5x2 smd paste-2 mask+0: 69(-2.9,3.4)
  rect 2.6x3.1 smd paste-3: 70(-2.9,0) 71(-2.9,-3.4) 72(0,-3.4) 73(2.9,-3.4) 74(2.9,0) 75(2.9,3.4) 76(0,3.4) 77(0,0)
  Top Layer region: -1.6,1.85 -4.2,1.85 -4.2,3.92 -3.17,4.95 -1.6,4.95
  Keep-Out Layer region: -5.5,5.8 -7,5.8 -7,7.3 -5.5,7.3
  Keep-Out Layer region: 6.8,2.3 4.65,2.3 4.65,7.6 6.8,7.6
  silkscreen extent -10.14,-9.8 9.8,9.8, body extent -9.8,-9.8 9.8,9.8, height 2.6
AFC01-S15FCC-00 [mm]
  rect 0.3x1.3 smd: 1(-3.5,1.34) 2(-3,1.34) 3(-2.5,1.34) 4(-2,1.34) 5(-1.5,1.34) 6(-1,1.34) 7(-0.5,1.34) 8(0,1.34) 9(0.5,1.34) 10(1,1.34) 11(1.5,1.34) 12(2,1.34) 13(2.5,1.34) 14(3,1.34) 15(3.5,1.34)
  rect 2x1.6 smd: MP1(-5.2,-1.34) MP2(5.2,-1.34)
  silkscreen extent -5.87,-3.63 5.87,1.91, body extent -5.9,-4.14 5.9,1.71, height 2.11
B3U-1000P [mm] "SWITCH TACTILE SPST-NO 0.05A 12V"
  rect 0.82x1.72 smd: 1(-1.7,0) 2(1.7,0)
  silkscreen extent -1.57,-1.3 1.57,1.3, body extent -2,-1.26 2,1.24, height 1.6
BWMMCX-KWE [mm]
  round 1.524 hole 1 paste+0 mask+0.05: 1(0,0)
  round 1.4 hole 0.9 paste+0 mask+0.05: 2(-1.25,1.25) 3(-1.25,-1.25) 4(1.25,-1.25) 5(1.25,1.25)
  silkscreen extent -1.78,-4.78 1.78,1.8, body extent -1.8,-4.81 1.8,1.8, height 4
CAP-0201 [mm]
  rect 0.3x0.3 smd mask+0.055: 1(-0.3,0) 2(0.3,0)
  silkscreen extent -0.53,-0.23 0.53,0.23, body extent -0.3,-0.15 0.3,0.15, height 0.28
Cap-0201 [mm]
  rect 0.3x0.3 smd mask+0.055: 1(-0.3,0) 2(0.3,0)
  silkscreen extent -0.53,-0.23 0.53,0.23, body extent -0.3,-0.15 0.3,0.15, height 0.28
Cap-0402 [mil]
  rect 18x25 smd mask+2.36: 1(-18.5,0) 2(18.5,0)
  silkscreen extent -31,-16 31,16, body extent -20,-10 20,10, height 19
Cap-0603 [mil]
  rect 30x35 smd mask+2.36: 1(-30,0) 2(30,0)
  silkscreen extent -49,-21 49,21, body extent -32,-16 31,16, height 34
Cap-0805 [mil] "SMD 0805"
  rect 40x60 smd mask+2.76: 1(-40,0) 2(40,0)
  silkscreen extent -64,-34 64,34, body extent -39,-25 39,25, height 30
Cap-1206 [mil] "SMD 1206"
  rect 60x70 smd: 1(-50,0) 2(50,0)
  silkscreen extent -84,-39 84,39, body extent -63,-31 63,32, height 39
Case-B [mm]
  rect 1.7x3 smd paste+0: 1(-1.7,0) 2(1.7,0)
  silkscreen extent -3.35,-1.63 2.03,1.63, body extent -1.85,-1.5 1.85,1.5, height 2.16
Case-D [mm]
  rect 2.4x2.9 smd: 1(-3.05,0) 2(3.05,0)
  silkscreen extent -4.7,-2.15 3.65,2.39, body extent -3.65,-2.16 3.65,2.14, height 4
Case-E [mm]
  rect 2.79x2.57 smd: 1(0,0) 2(6.44,0)
  silkscreen extent -1.56,-2.31 7.03,2.31, body extent -0.27,-2.21 6.92,2.21, height 2.88
DB128L-5.08-2P-BK-S [mm]
  rect 3x3 hole 1.6: 1(-2.54,0)
  round 3 hole 1.6: 2(2.54,0)
  silkscreen extent -5.13,-5.08 5.13,5.13, body extent -5.08,-5.03 5.13,5.07, height 10.3
DB128L-5.08-3P-BK-S [mm]
  rect 3x3 hole 1.6: 1(-5.08,0)
  round 3 hole 1.6: 2(0,0) 3(5.08,0)
  silkscreen extent -7.67,-5.08 7.67,5.13, body extent -7.59,-5.03 7.65,5.07, height 10.1
DSN0603-2 [mm]
  rect 0.2x0.24 smd mask+0.055: 1(-0.2,0) 2(0.2,0)
  silkscreen extent -0.38,-0.2 0.38,0.2, body extent -0.3,-0.15 0.3,0.15, height 0.32
Fuse-0603 [mm]
  rect 1x1 smd: 1(-0.85,0) 2(0.85,0)
  silkscreen extent -0.25,-0.48 0.25,0.48, body extent -0.77,-0.42 0.78,0.43, height 0.45
Fuse-0805 [mm]
  rect 1x1.7 smd: 1(-1.1,0) 2(1.1,0)
  silkscreen extent -0.41,-0.81 0.41,0.81, body extent -1.1,-0.75 1.1,0.75, height 1.24
Fuse-2920 [mm]
  rect 2.3x5.6 smd: 1(-3.7,0) 2(3.7,0)
  silkscreen extent -2.18,-2.62 2.24,2.62, body extent -3.68,-2.56 3.68,2.56, height 0.9
FXL0630-5R6-M [mm]
  rect 2.35x3.5 smd: 1(-3.025,0) 2(3.025,0)
  silkscreen extent -3.84,-3.35 3.4,3.35, body extent -3.5,-3.3 3.5,3.3, height 2.6
"G6K-2F-Y-TR DC5" [mm]
  rect 1.8x0.8 smd: 1(-3.5,3.8) 2(-3.5,0.6) 3(-3.5,-1.6) 4(-3.5,-3.8) 5(3.5,-3.8) 6(3.5,-1.6) 7(3.5,0.6) 8(3.5,3.8)
  silkscreen extent -4.82,-5.08 3.38,5.08, body extent -3.9,-5 3.9,5, height 5.2
H1102NLT [mm]
  rect 1.67x0.76 smd: 1(-4.265,4.445) 2(-4.265,3.175) 3(-4.265,1.905) 4(-4.265,0.635) 5(-4.265,-0.635) 6(-4.265,-1.905) 7(-4.265,-3.175) 8(-4.265,-4.445) 9(4.265,-4.445) 10(4.265,-3.175) 11(4.265,-1.905) 12(4.265,-0.635) 13(4.265,0.635) 14(4.265,1.905) 15(4.265,3.175) 16(4.265,4.445)
  silkscreen extent -5.48,-6.35 3.55,6.35, body extent -4.7,-6.35 4.7,6.35, height 5.97
"HX20012-6A BLACK" [mil]
  rect 60x60 hole 36 paste+0 mask+2: 1(-78.74,-39.37)
  round 60 hole 36 paste+0 mask+2: 2(-78.74,39.37) 3(0,-39.37) 4(0,39.37) 5(78.74,-39.37) 6(78.74,39.37)
  silkscreen extent -160,-108 160,108, body extent -157,-106 158,106, height 260
IND-0201 [mm]
  rect 0.25x0.3 smd mask+0.055: 1(-0.275,0) 2(0.275,0)
  silkscreen extent -0.48,-0.23 0.48,0.23, body extent -0.3,-0.15 0.3,0.15, height 0.15
"IND-0603 (1608 Metric)" [mm] "0.063\" L x 0.032\" W (1.60mm x 0.80mm)"
  rect 0.6x0.8 smd: 1(-0.7,0) 2(0.7,0)
  silkscreen extent -0.2,-0.46 0.23,0.46, body extent -0.8,-0.4 0.8,0.4, height 0.78
Ind-0805 [mm] "Inductor 0805"
  rect 1.2x1.32 smd: 1(-1,0) 2(1,0)
  silkscreen extent -0.25,-0.69 0.25,0.69, body extent -1,-0.62 1,0.63, height 0.47
JK250-080U [mm]
  round 1.8 hole 1.2 paste+0 mask+0.051: 1(0,0) 2(5.1,0)
  silkscreen extent -0.35,-1.9 5.45,1.9
K2-1102SP-C4SC-04 [mm]
  rect 1.15x1 smd: 1(-4.175,2.25) 2(4.175,2.25) 3(-4.175,-2.25) 4(4.175,-2.25)
  silkscreen extent -5.16,-3.05 3.15,3.05, body extent -4.75,-3 4.75,3, height 5.07
LED-0603 [mm]
  rect 0.5x1 smd: 1(-0.75,0) 2(0.75,0)
  silkscreen extent -1.12,-0.66 1.75,0.66, body extent -0.82,-0.37 0.82,0.36, height 0.68
LQFP-100 [mm]
  rect 1.2x0.3 smd: 1(-7.75,6) 2(-7.75,5.5) 3(-7.75,5) 4(-7.75,4.5) 5(-7.75,4) 6(-7.75,3.5) 7(-7.75,3) 8(-7.75,2.5) 9(-7.75,2) 10(-7.75,1.5) 11(-7.75,1) 12(-7.75,0.5) 13(-7.75,0) 14(-7.75,-0.5) 15(-7.75,-1) 16(-7.75,-1.5) 17(-7.75,-2) 18(-7.75,-2.5) 19(-7.75,-3) 20(-7.75,-3.5) 21(-7.75,-4) 22(-7.75,-4.5) 23(-7.75,-5) 24(-7.75,-5.5) 25(-7.75,-6) 51(7.75,-6) 52(7.75,-5.5) 53(7.75,-5) 54(7.75,-4.5) 55(7.75,-4) 56(7.75,-3.5) 57(7.75,-3) 58(7.75,-2.5) 59(7.75,-2) 60(7.75,-1.5) 61(7.75,-1) 62(7.75,-0.5) 63(7.75,0) 64(7.75,0.5) 65(7.75,1) 66(7.75,1.5) 67(7.75,2) 68(7.75,2.5) 69(7.75,3) 70(7.75,3.5) 71(7.75,4) 72(7.75,4.5) 73(7.75,5) 74(7.75,5.5) 75(7.75,6)
  rect 0.3x1.2 smd: 26(-6,-7.75) 27(-5.5,-7.75) 28(-5,-7.75) 29(-4.5,-7.75) 30(-4,-7.75) 31(-3.5,-7.75) 32(-3,-7.75) 33(-2.5,-7.75) 34(-2,-7.75) 35(-1.5,-7.75) 36(-1,-7.75) 37(-0.5,-7.75) 38(0,-7.75) 39(0.5,-7.75) 40(1,-7.75) 41(1.5,-7.75) 42(2,-7.75) 43(2.5,-7.75) 44(3,-7.75) 45(3.5,-7.75) 46(4,-7.75) 47(4.5,-7.75) 48(5,-7.75) 49(5.5,-7.75) 50(6,-7.75) 76(6,7.75) 77(5.5,7.75) 78(5,7.75) 79(4.5,7.75) 80(4,7.75) 81(3.5,7.75) 82(3,7.75) 83(2.5,7.75) 84(2,7.75) 85(1.5,7.75) 86(1,7.75) 87(0.5,7.75) 88(0,7.75) 89(-0.5,7.75) 90(-1,7.75) 91(-1.5,7.75) 92(-2,7.75) 93(-2.5,7.75) 94(-3,7.75) 95(-3.5,7.75) 96(-4,7.75) 97(-4.5,7.75) 98(-5,7.75) 99(-5.5,7.75) 100(-6,7.75)
  silkscreen extent -8.64,-7.27 7.24,7.24, body extent -8,-8 8,8, height 1.6
MC-318FB [mm]
  rect 0.3x1 smd: A1(-2.75,0.72) A2(-2.25,0.72) A3(-1.75,0.72) A4(-1.25,0.72) A5(-0.75,0.72) A6(-0.25,0.72) A7(0.25,0.72) A8(0.75,0.72) A9(1.25,0.72) A10(1.75,0.72) A11(2.25,0.72) A12(2.75,0.72) B1(2.75,-0.72) B2(2.25,-0.72) B3(1.75,-0.72) B4(1.25,-0.72) B5(0.75,-0.72) B6(0.25,-0.72) B7(-0.25,-0.72) B8(-0.75,-0.72) B9(-1.25,-0.72) B10(-1.75,-0.72) B11(-2.25,-0.72) B12(-2.75,-0.72)
  round 0 hole 0.66 unplated: MH1(-3.75,0)
  round 0 hole 0.58 slot 1 at 0 deg unplated: MH2(3.75,0)
  round 1 hole 0.7: MP1(-2.4,2.15) MP2(2.4,2.15) MP3(2.4,-2.15) MP4(-2.4,-2.15)
  silkscreen extent -4.48,-1.65 4.55,1.65, body extent -4.43,-2.28 4.44,2.28, height 10.49
"Pogo 4 Pin" [mm]
  round 1.6 smd: 1(-3.75,0) 2(-1.25,0) 3(1.25,0) 4(3.75,0)
  silkscreen extent -5.11,-1.09 4.83,1.09
"POGO 6 Pin" [mm]
  round 1.6 smd: 1(-5,0) 2(-2.5,0) 3(0,0) 4(2.5,0) 5(5,0) 6(7.5,0)
  silkscreen extent -6.36,-1.09 8.66,1.09
RC01835 [mm]
  round 1.3 hole 0.9 paste+0 mask+0.05: 1(-3.57,-2.7) 2(-2.55,-3.8) 3(-1.53,-2.7) 4(-0.51,-3.8) 5(0.51,-2.7) 6(1.53,-3.8) 7(2.55,-2.7) 8(3.57,-3.8) 9(-7.06,-1.6) 10(-4.77,-1.6) 11(4.77,-1.6) 12(7.06,-1.6)
  oval 1.5x3 hole 1 slot 2.4 at 90 deg paste+0 mask+0.05: 13(-8,3.8) 14(8,3.8)
  silkscreen extent -8.13,-4.04 8.13,11.81, body extent -8.1,-4.01 8.1,11.71, height 7.12
Res-0201 [mm]
  rect 0.27x0.37 smd mask+0.055: 1(-0.275,0) 2(0.275,0)
  silkscreen extent -0.48,-0.25 0.48,0.25, body extent -0.3,-0.15 0.3,0.15, height 0.29
Res-0402 [mil]
  rect 18x25 smd mask+2.17: 1(-18.5,0) 2(18.5,0)
  silkscreen extent -32,-17 32,16, body extent -23,-11 23,11, height 16
Res-0603 [mil]
  rect 30x35 smd: 1(-30,0) 2(30,0)
  silkscreen extent -48,-21 48,21, body extent -31,-17 31,17, height 18
RES-0603 [mil]
  rect 30x35 smd: 1(-30,0) 2(30,0)
  silkscreen extent -48,-21 48,21, body extent -31,-17 31,17, height 18
RES-0805 [mil] "SMD 0805"
  rect 40x50 smd: 1(-40,0) 2(40,0)
  silkscreen extent -64,-29 64,29, body extent -39,-25 39,24, height 24
Res-1206 [mil]
  rect 60x70 smd: 1(-50,0) 2(50,0)
  silkscreen extent -84,-39 84,39, body extent -63,-31 63,31, height 24
RFANT3216120A5T [mm]
  rect 0.8x1.66 smd paste+0 mask+0.051: 1(-1.55,0) 2(1.55,0)
  silkscreen extent -2.06,-0.99 2.06,0.97, body extent -1.6,-0.8 1.6,0.8, height 1.2
RVT1H101M0607 [mm]
  rect 3.5x1.6 smd: 1(-2.8,0) 2(2.8,0)
  silkscreen extent -4.27,-3.33 3.32,3.33, body extent -3.31,-3.33 3.29,3.27, height 7.94
SMA(DO-214AC) [mm]
  rect 1.6x2.8 smd: 1(-1.9,0) 2(1.9,0)
  silkscreen extent -3.99,-1.6 2.84,1.6, body extent -2.6,-1.45 2.6,1.45, height 2.3
"SMB Bi Directional" [mm]
  rect 2.8x2.4 smd: 1(-2.3,0) 2(2.3,0)
  silkscreen extent -2.21,-1.85 2.39,1.85, body extent -2.7,-1.8 2.7,1.8, height 2.3
SMB_ [mm]
  rect 2.8x2.4 smd: 1(-2.3,0) 2(2.3,0)
  silkscreen extent -2.21,-1.91 4.83,1.9, body extent -2.7,-1.8 2.7,1.8, height 2.3
SMD2012-2P [mm]
  rect 0.7x1.4 smd: 1(-0.75,0) 2(0.75,0)
  silkscreen extent -0.18,-0.61 0.18,0.61, body extent -1.02,-0.62 1.03,0.58, height 0.6
SOD-123 [mm]
  rect 0.95x0.9 smd: 1(-1.575,0) 2(1.575,0)
  silkscreen extent -1.37,-0.8 2.82,0.8, body extent -1.82,-0.77 1.83,0.78, height 1.5
SOD-323 [mm]
  rect 0.8x0.9 smd mask+0.055: 1(-1.15,0) 2(1.15,0)
  silkscreen extent -2.01,-0.79 0.94,0.79, body extent -1.3,-0.67 1.3,0.67, height 1.1
SOD-523 [mm] "SOD-523 Schottky Barrier Diodes (SBD) ROHS"
  rect 0.6x0.7 smd: 1(-0.6,0) 2(0.6,0)
  silkscreen extent -0.61,-0.53 1.43,0.53, body extent -0.8,-0.4 0.8,0.4, height 0.7
"SOIC-8 (208 mil)" [mm]
  rect 1.61x0.58 smd: 1(-3.605,1.905) 2(-3.605,0.635) 3(-3.605,-0.635) 4(-3.605,-1.905) 5(3.605,-1.905) 6(3.605,-0.635) 7(3.605,0.635) 8(3.605,1.905)
  silkscreen extent -4.7,-2.69 2.69,2.69, body extent -3.95,-2.64 3.95,2.64, height 2.16
"SOIC-8(0.154\", 3.90mm Width)" [mm]
  rect 1.55x0.6 smd: 1(-2.7,1.905) 2(-2.7,0.635) 3(-2.7,-0.635) 4(-2.7,-1.905) 5(2.7,-1.905) 6(2.7,-0.635) 7(2.7,0.635) 8(2.7,1.905)
  silkscreen extent -3.79,-2.51 1.8,2.51, body extent -3.01,-2.45 3.01,2.45, height 1.63
"Solder Bridge" [mil] "Solder Bridge ON"
  rect 30x35 smd: 1(-30,0) 2(30,0)
  silkscreen extent -50,-22 50,22
SOP-8 [mm]
  rect 1.3x0.7 smd: 1(-2.75,1.905) 2(-2.75,0.635) 3(-2.75,-0.635) 4(-2.75,-1.905) 5(2.75,-1.905) 6(2.75,-0.635) 7(2.75,0.635) 8(2.75,1.905)
  silkscreen extent -3.69,-2.57 2.03,2.57, body extent -3.1,-2.5 3.1,2.5, height 1.76
SOP-16 [mil]
  rect 57.55x22 smd: 1(-107.27,175) 2(-107.27,125) 3(-107.27,75) 4(-107.27,25) 5(-107.27,-25) 6(-107.27,-75) 7(-107.27,-125) 8(-107.27,-175) 9(107.27,-175) 10(107.27,-125) 11(107.27,-75) 12(107.27,-25) 13(107.27,25) 14(107.27,75) 15(107.27,125) 16(107.27,175)
  silkscreen extent -149,-199 84,199, body extent -122,-197 122,197, height 69
SOP-16_150mil [mm]
  rect 1.1x0.6 smd: 1(-2.875,4.445) 2(-2.875,3.175) 3(-2.875,1.905) 4(-2.875,0.635) 5(-2.875,-0.635) 6(-2.875,-1.905) 7(-2.875,-3.175) 8(-2.875,-4.445) 9(2.875,-4.445) 10(2.875,-3.175) 11(2.875,-1.905) 12(2.875,-0.635) 13(2.875,0.635) 14(2.875,1.905) 15(2.875,3.175) 16(2.875,4.445)
  silkscreen extent -3.71,-5.03 1.91,5.03, body extent -3.04,-5 3.04,5, height 1.62
SOT-23 [mm] "TRANS NPN 40V 0.6A SOT23"
  rect 0.82x0.92 smd: 1(-0.95,-1) 2(0.95,-1) 3(0,1)
  silkscreen extent -1.68,-1.3 1.55,0.81, body extent -1.5,-1.25 1.5,1.25, height 1.05
Sot-23 [mm] "TRANS NPN 40V 0.6A SOT23"
  rect 0.82x0.92 smd: 1(-0.95,-1) 2(0.95,-1) 3(0,1)
  silkscreen extent -1.68,-1.3 1.55,0.81, body extent -1.5,-1.25 1.5,1.25, height 1.05